# Altium PCB PCB_top.PcbDoc (part 1 of 2)
Units mil, origin at the board's own origin, x right, y up, seen from the top; angles counter-clockwise.
Board outline 2425.02 x 2425.02 mil, 4 copper layers (TOP, 2, 3, BOTTOM), stack 61.024 mil thick; 91 components, 64 nets, 335 pads, 235 vias.
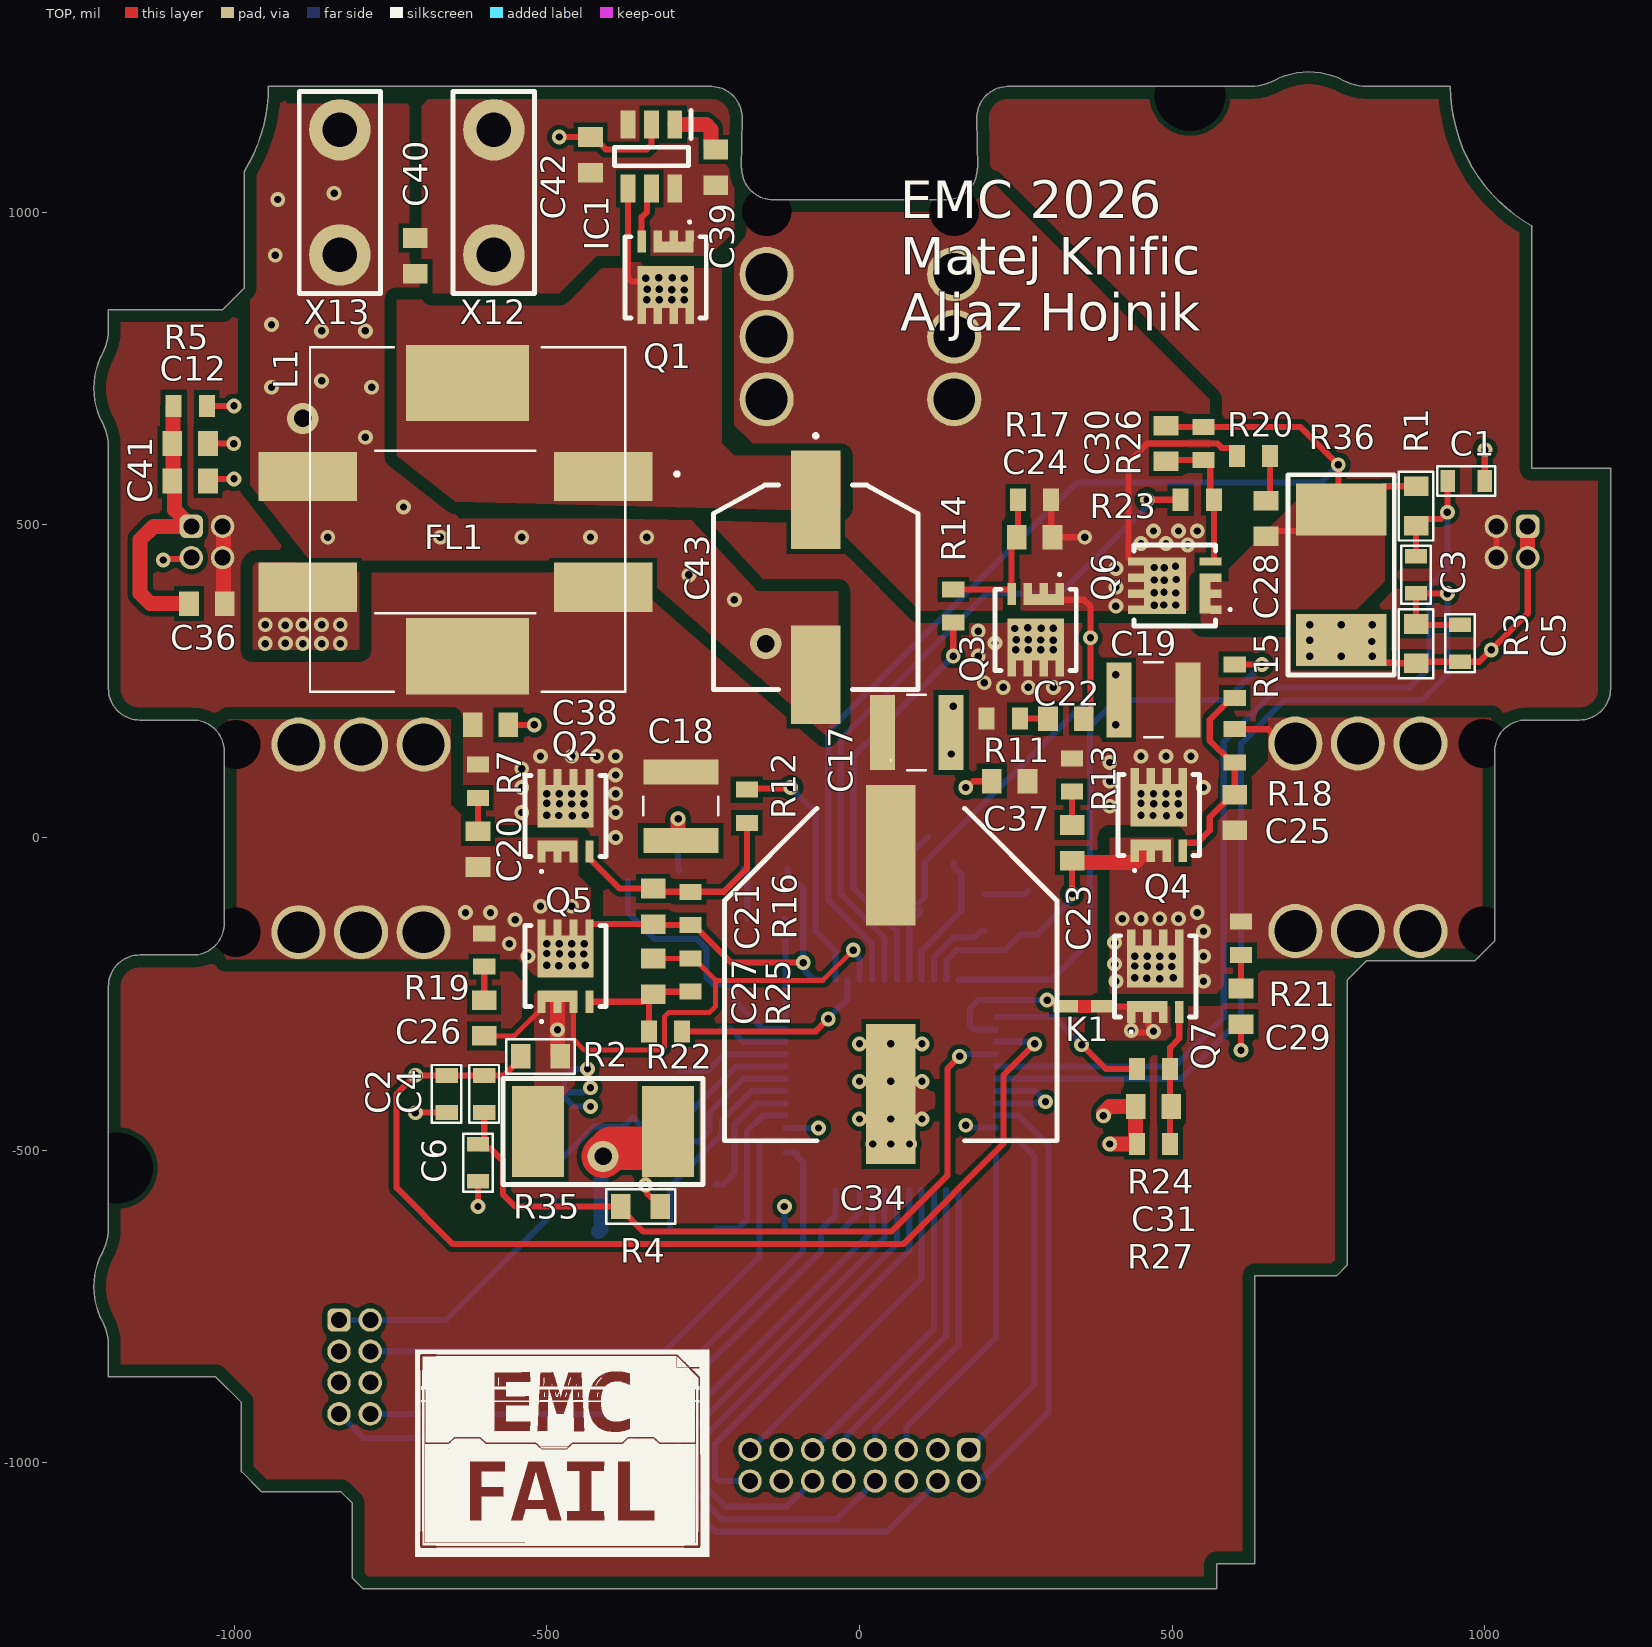
[diagram p0: TOP view]
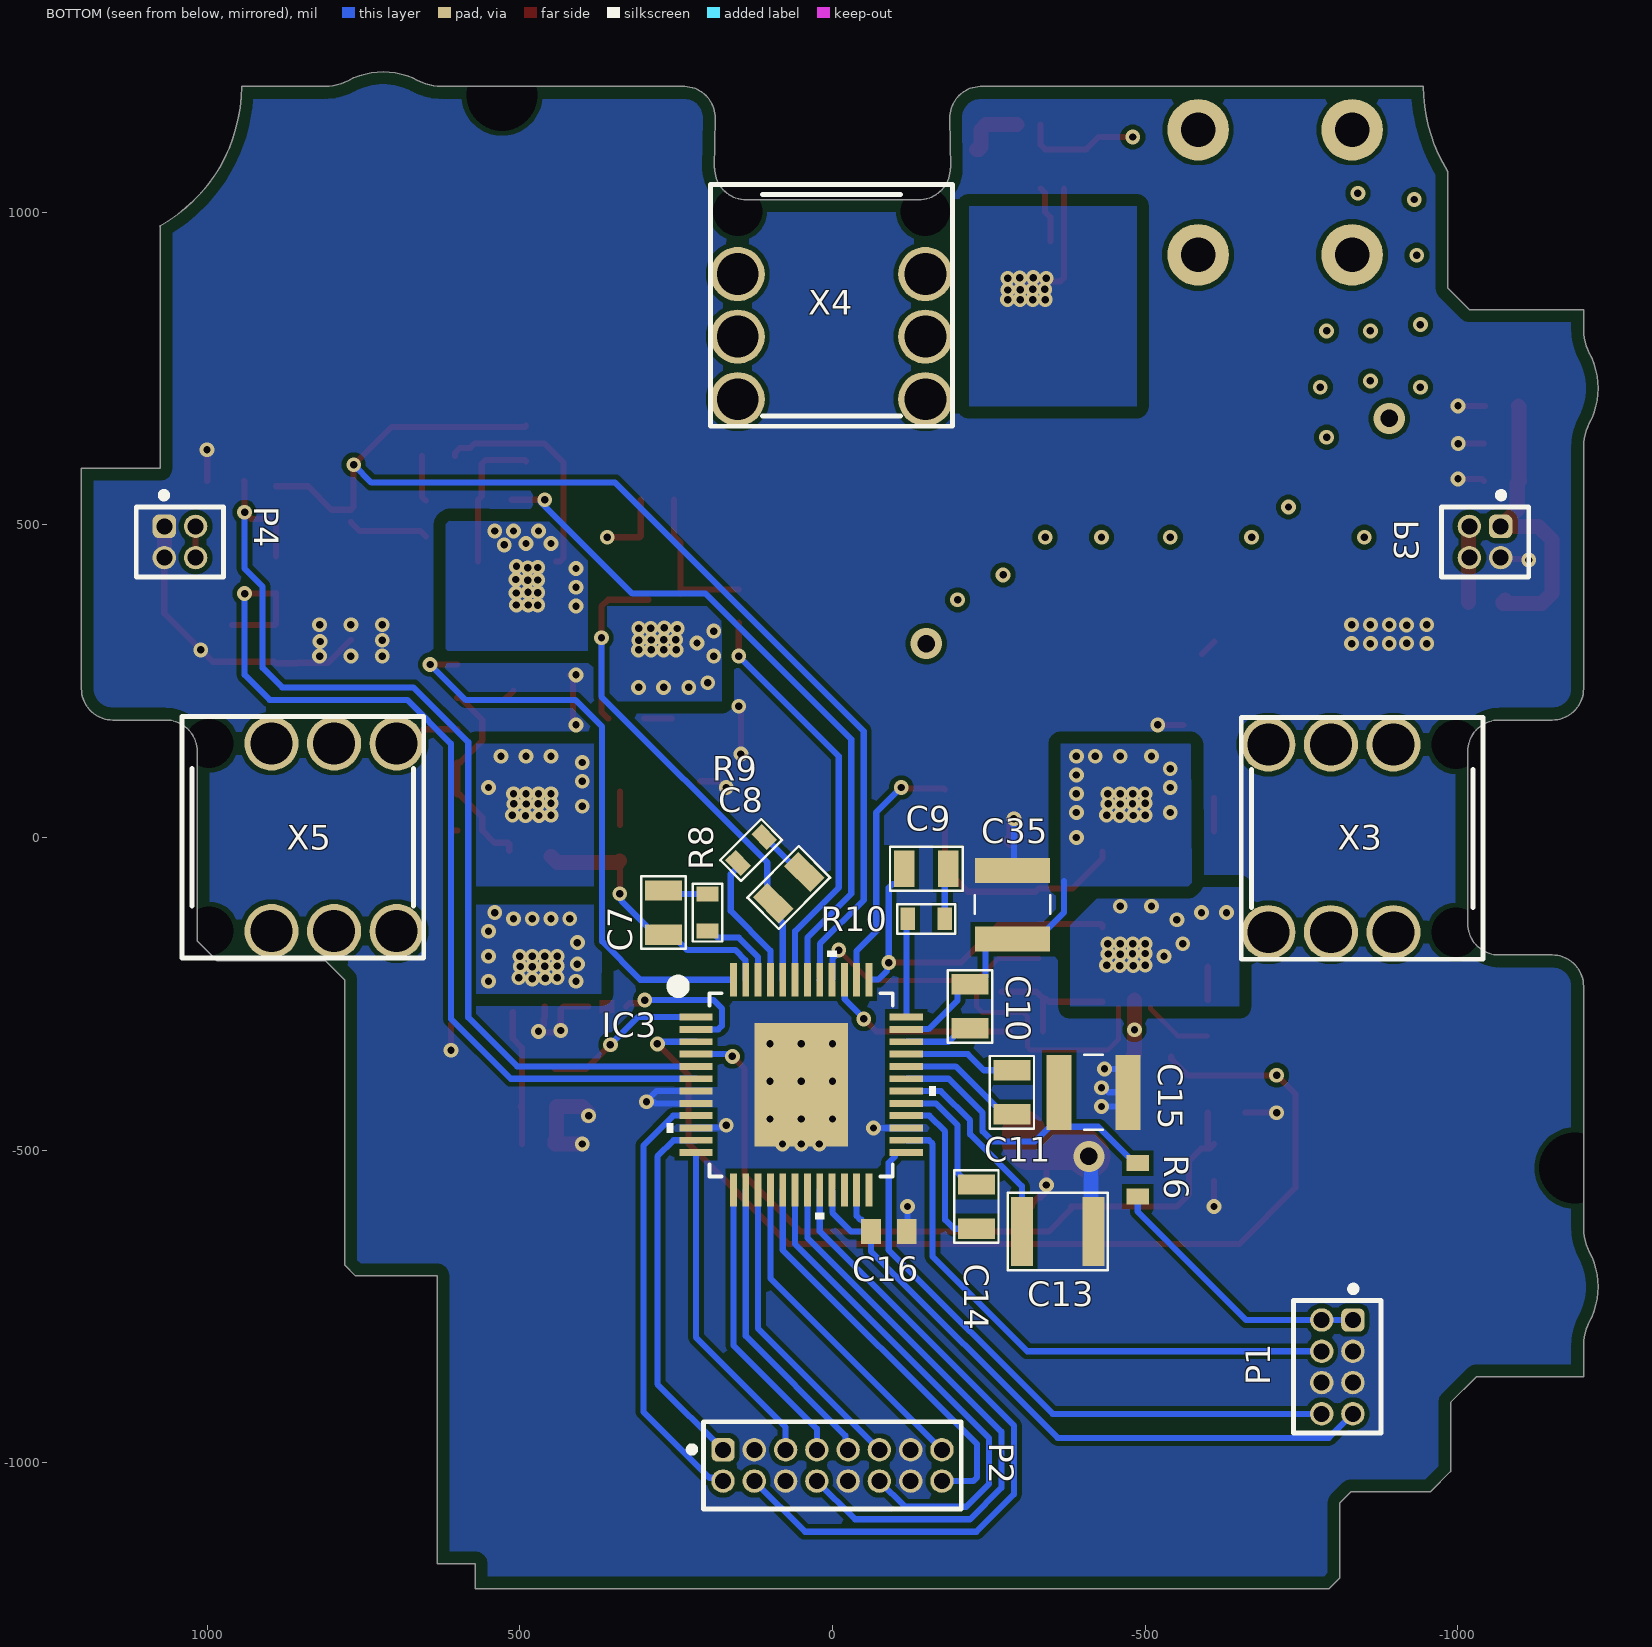
[diagram p1: BOTTOM view, seen from below]
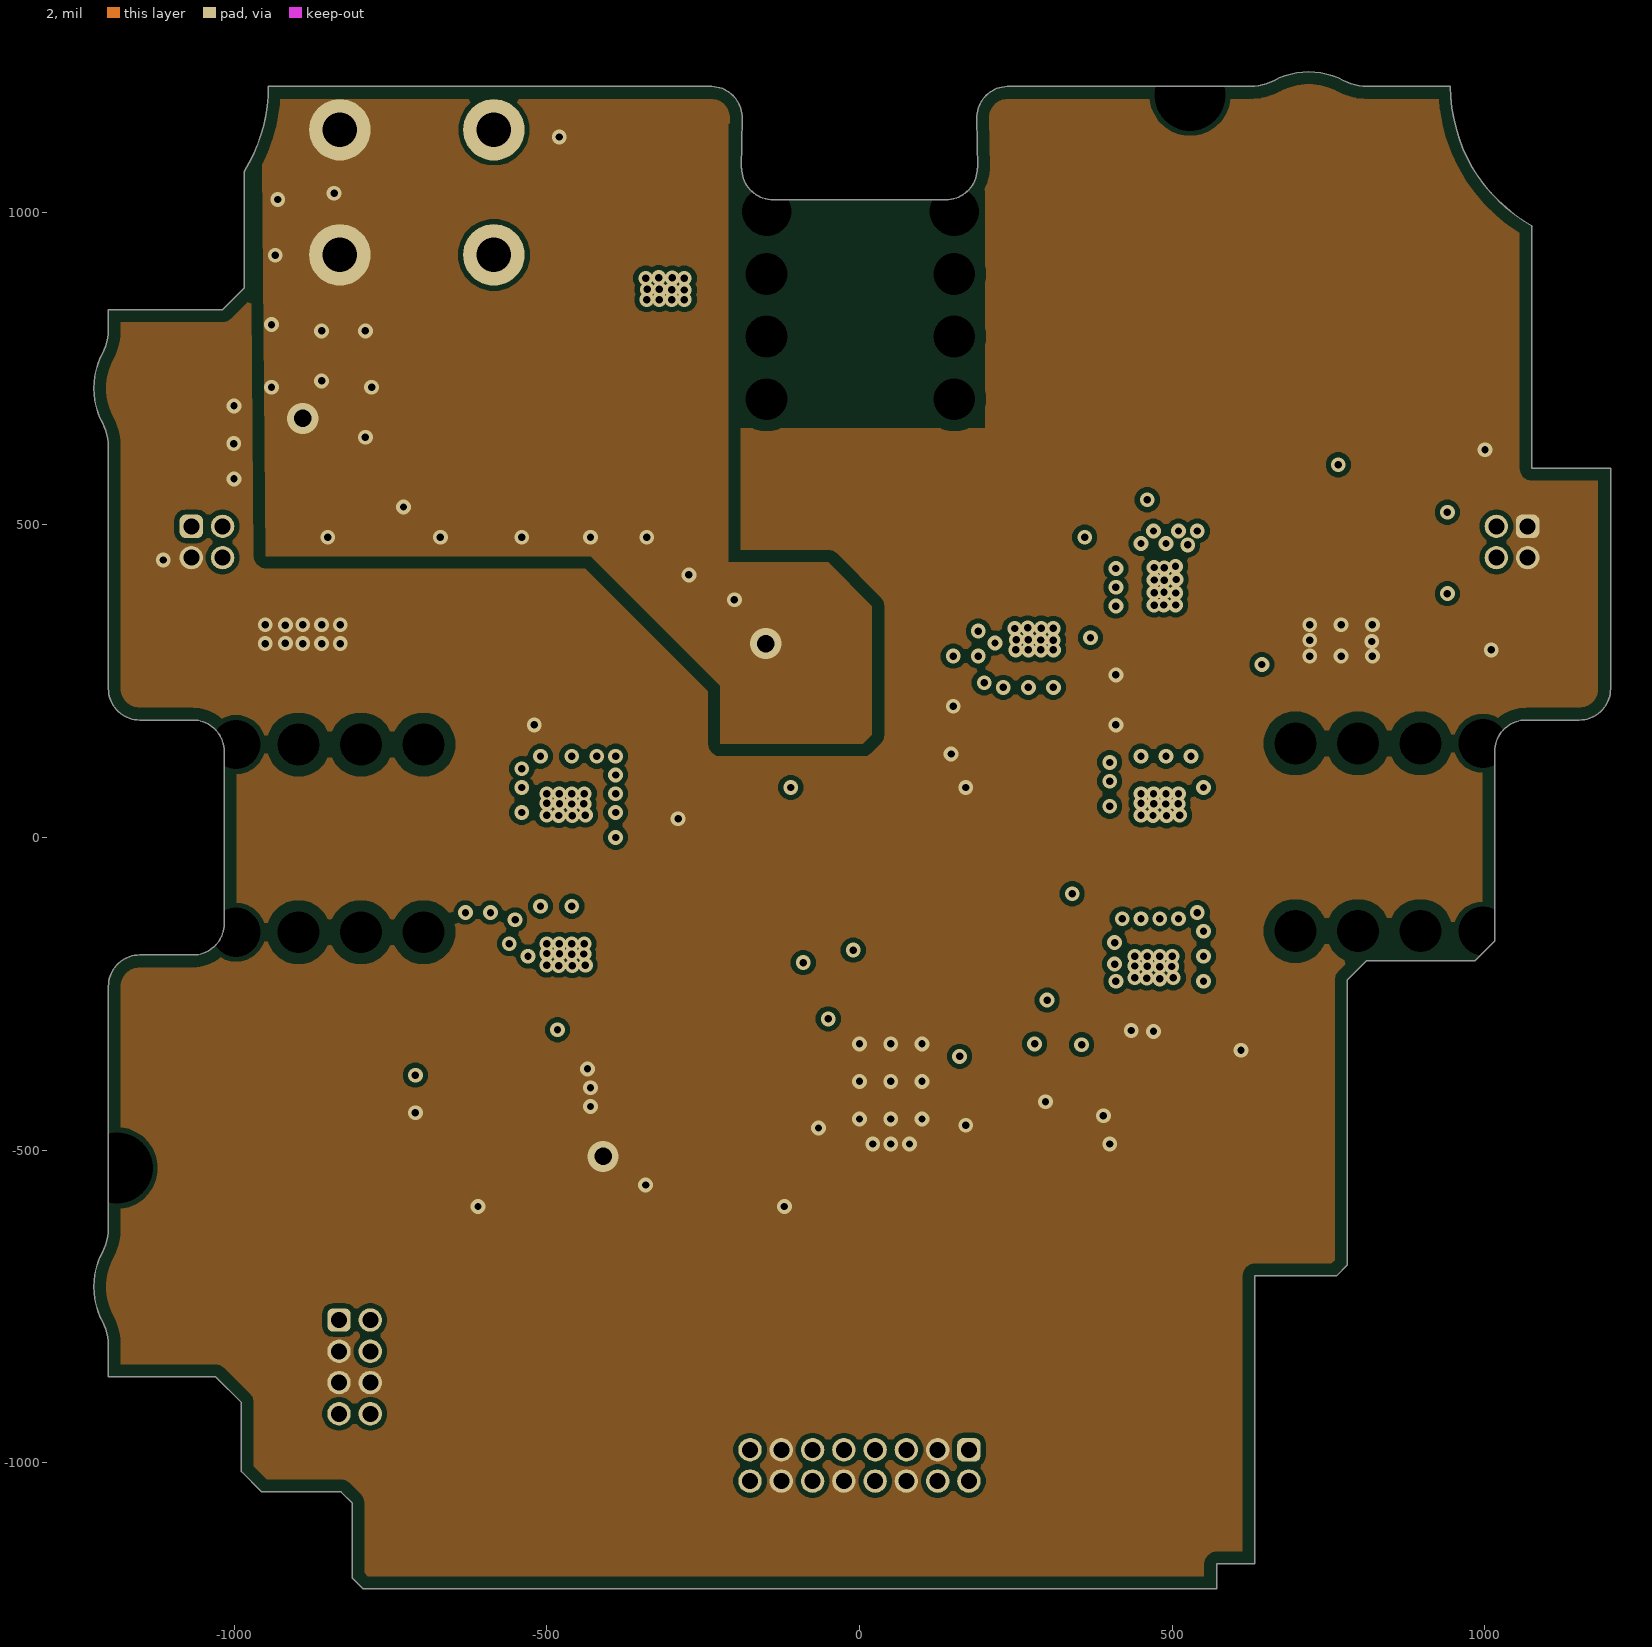
[diagram p2: 2]
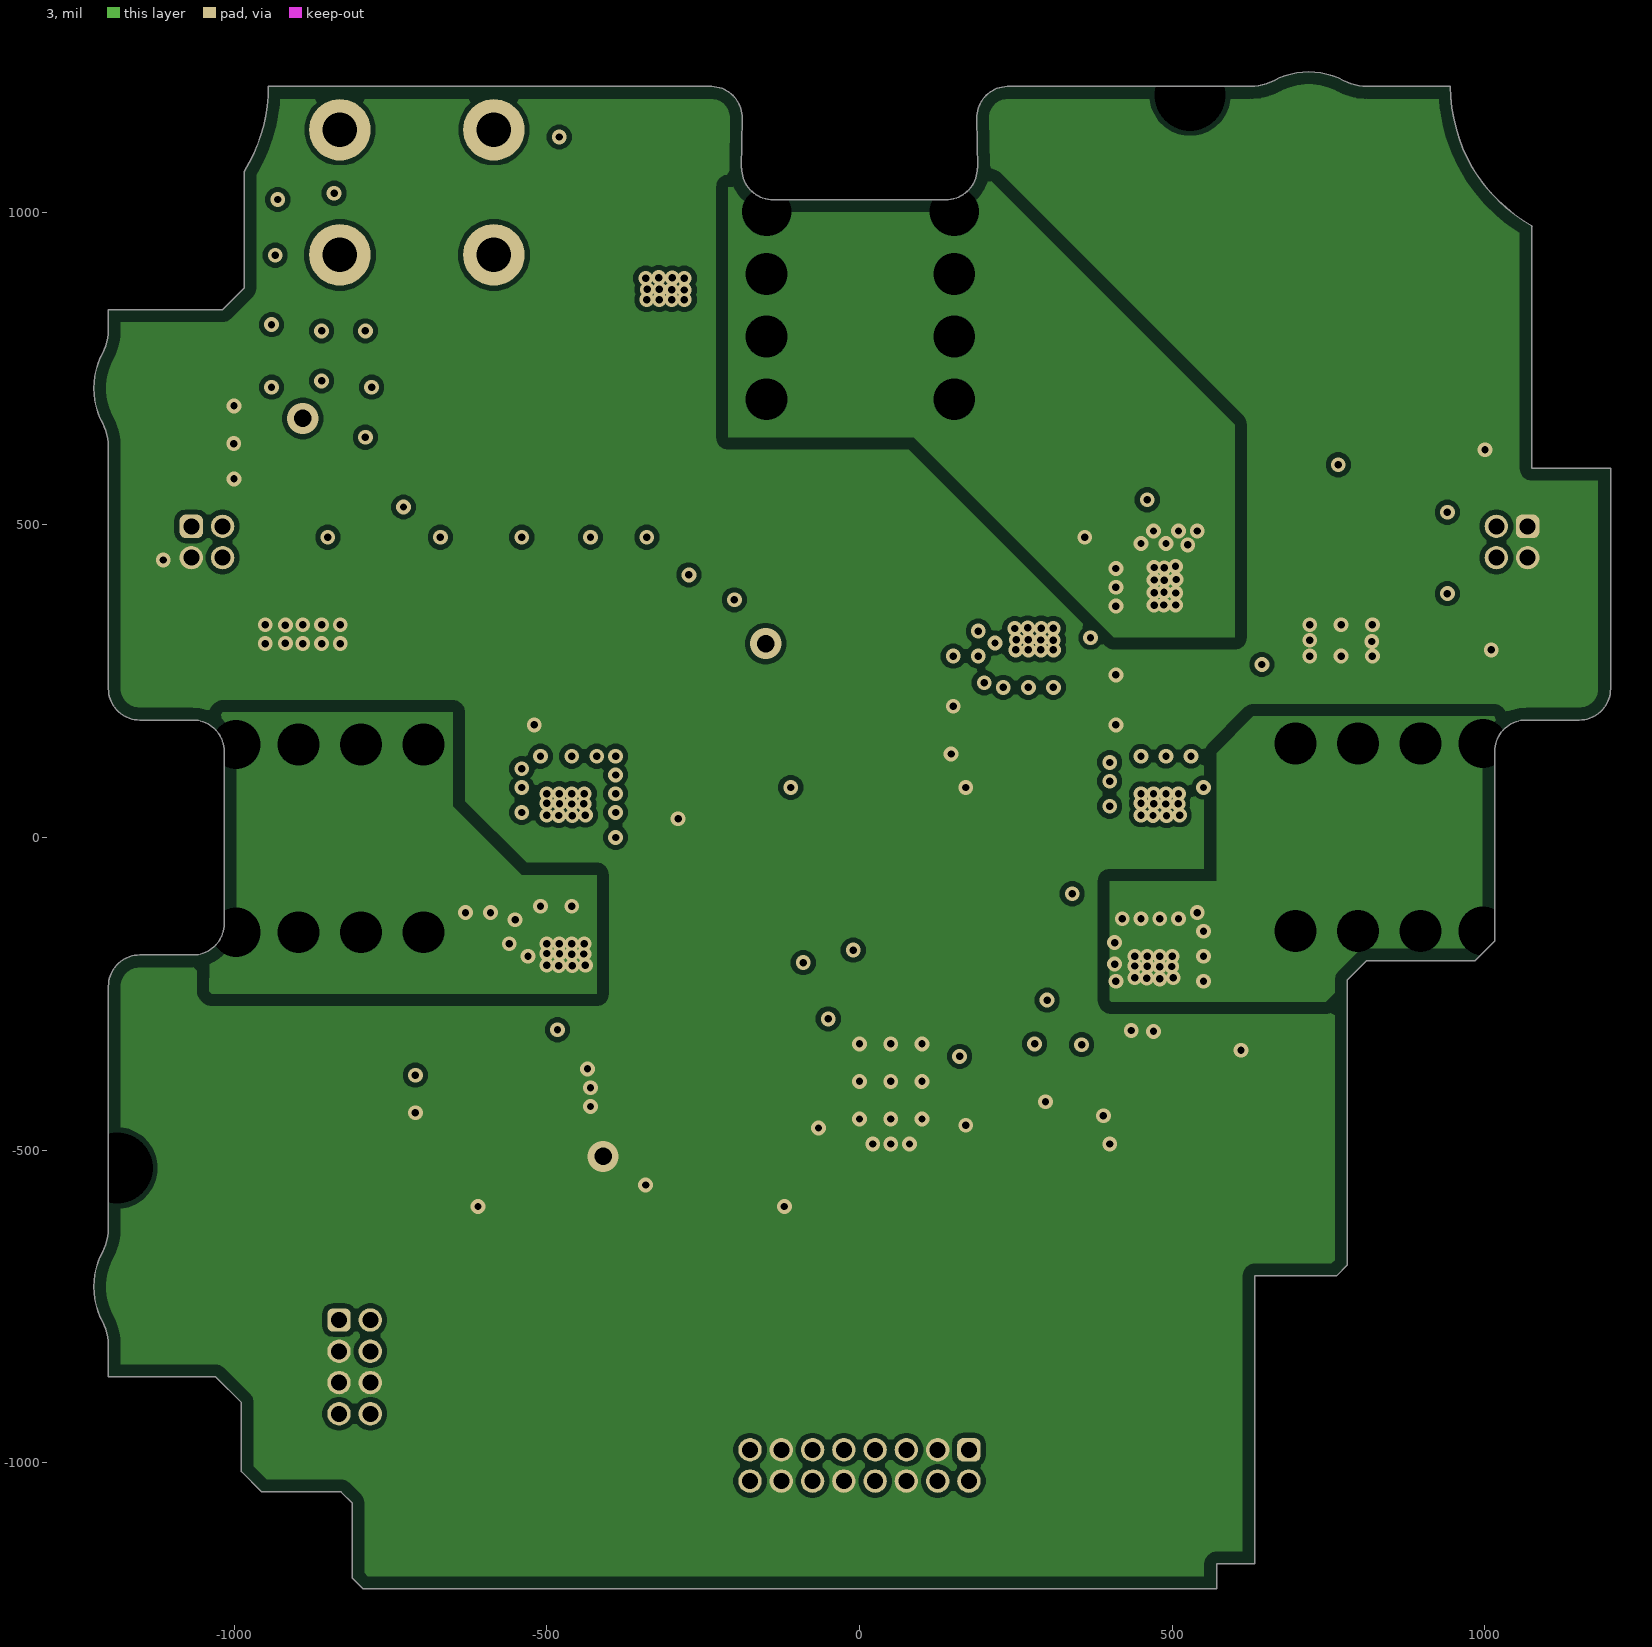
[diagram p3: 3]
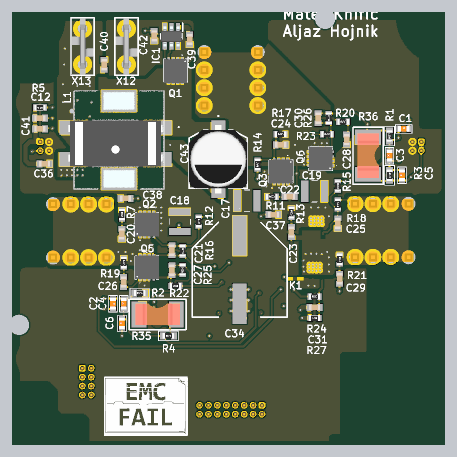
[diagram p4: 3D render of the assembled board from above, using the file's embedded part models]
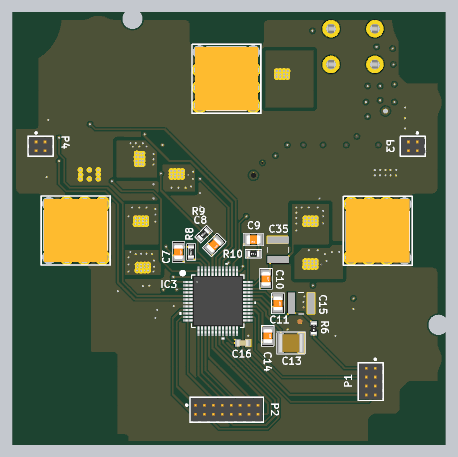
[diagram p5: 3D render of the assembled board from below, using the file's embedded part models]

## Layer stack, top to bottom
Top Solder: solder mask 0.3937, Solder Resist, Dk 3.5
TOP: signal copper 2.7559
Dielectric 4: prepreg 12.4016, PP-006, Dk 4.1
2: signal copper 1.378
Dielectric 3: core 27.9528, S1000-2, Dk 4.5
3: signal copper 1.378
Dielectric 2: prepreg 12.4016, PP-006, Dk 4.1
BOTTOM: signal copper 2.7559
Bottom Solder: solder mask 0.3937, Solder Resist, Dk 3.5

## Board outline
-1200.79,-811.49 ccw(c-1279.53,-811.49) -1210.16,-774.22 cw(c-1106.12,-718.32) -1210.16,-662.42 ccw(c-1279.53,-625.16) -1200.79,-625.16 -1200.79,-237.8 cw(c-1150.79,-237.8) -1150.79,-187.8 -1065.75,-187.8 ccw(c-1065.75,-137.8) -1015.75,-137.8 -1015.75,137.8 ccw(c-1065.75,137.8) -1065.75,187.8 -1150.79,187.8 cw(c-1150.79,237.8) -1200.79,237.8 -1200.79,625.16 ccw(c-1279.53,625.16) -1210.16,662.42 cw(c-1106.12,718.32) -1210.16,774.22 ccw(c-1279.53,811.49) -1200.79,811.49 -1200.79,844.17 -1018.03,844.17 -983.78,878.43 -983.78,1065.16 ccw(c-1200.79,1200.79) -944.88,1200.79 -236.22,1200.79 cw(c-237.55,1150.91) -187.67,1149.59 -188.94,1070.27 -188.5,1070.27 ccw(c-137.92,1070.27) -137.92,1019.69 137.92,1019.69 ccw(c137.92,1070.27) 188.5,1070.27 188.94,1070.27 187.67,1149.59 cw(c237.55,1150.91) 236.22,1200.79 625.16,1200.79 ccw(c625.16,1279.53) 662.42,1210.16 cw(c718.32,1106.12) 774.22,1210.17 ccw(c811.49,1279.53) 811.49,1200.79 944.88,1200.79 ccw(c1200.79,1200.79) 1075.51,977.64 1074.8,978.04 1074.8,590.55 1200.79,590.55 1200.79,237.8 cw(c1150.79,237.8) 1150.79,187.8 1065.75,187.8 ccw(c1065.75,137.8) 1015.75,137.8 1015.75,-165.54 984.44,-196.85 810.96,-196.85 779.53,-228.29 779.53,-683.99 762.53,-700.99 632.08,-700.99 632.09,-1161.42 570.87,-1161.42 570.87,-1200.79 -794.29,-1200.79 -811.02,-1184.06 -811.02,-1063.98 -828.74,-1046.26 -955.71,-1046.26 -988.19,-1013.78 -988.19,-903.54 -1029.53,-862.2 -1200.79,-862.2

## Design rules (kind name [scope] priority, off if disabled: settings)
BoardOutlineClearance [All] p1: gap=19.68 ignorepadtopadclearanceinfootprint=FALSE
Clearance "Clearance TP Bottom" [InPadClass('Test pads') AND OnBottomLayer vs InPadClass('Test pads') AND OnBottomLayer] p1: gap=100 ignorepadtopadclearanceinfootprint=FALSE
Clearance "Clearance PE" [InNet('PE')] p2: gap=19.68 ignorepadtopadclearanceinfootprint=FALSE
Clearance "Clearance spacers" [InComponentClass('Spacer')] p3: gap=19.68 ignorepadtopadclearanceinfootprint=FALSE
Clearance "Clearance Polygon" [InPolygon vs InPolygon] p4: gap=19.68 ignorepadtopadclearanceinfootprint=FALSE
Clearance "Clearance All" [NOT InComponent('U1') AND NOT InPadClass('Exception pads')] p5: gap=7.87 ignorepadtopadclearanceinfootprint=FALSE
Clearance "Clearance Via" [IsVia vs IsPad And Not (InComponentClass('PowerComponents') Or InPadClass('Power pads'))] p6 off: gap=9.84 ignorepadtopadclearanceinfootprint=FALSE
ComponentClearance "ComponentClearance Wave Soldering" [InComponentClass('THT Components')] p1: gap=118.11 collisioncheckmode=3 verticalgap=100000 showdistances=TRUE
ComponentClearance "ComponentClearance Selective Soldering" [InComponentClass('Selective Soldering Component')] p2: gap=118.11 collisioncheckmode=3 verticalgap=100000 showdistances=TRUE
ComponentClearance [OnLayer('Top Layer') vs OnLayer('Top Layer')] p3: gap=8 collisioncheckmode=3 verticalgap=10 showdistances=FALSE
FabricationTestPointUsage TestPointUsage [InNetClass('All Nets')] p1 off: valid=0 allowmultiple=FALSE
FabricationTestpoint Testpoint [(InNetClass('All Nets')) And ((IsPad And (OnTopLayer Or OnBottomLayer)))] p1 off: side=2 testpointundercomponent=FALSE minsize=39.37 maxsize=78.74 preferedsize=47.24 minholesize=0 maxholesize=78.74 preferedholesize=39.37 testpointgrid=0.39 allowsidebottom=TRUE usegrid=TRUE gridtolerance=0.01
FanoutControl Fanout_BGA [IsBGA] p1: bgadir=Out bgaviamode=Centered fanoutstyle=Auto fanoutdirection=InThenOut viagrid=1 // Fanout_BGA (Default Rule)
FanoutControl Fanout_LCC [IsLCC] p2: bgadir=Out bgaviamode=Centered fanoutstyle=Auto fanoutdirection=InThenOut viagrid=1 // Fanout_LCC (Default Rule)
FanoutControl Fanout_SOIC [IsSOIC] p3: bgadir=Out bgaviamode=Centered fanoutstyle=Auto fanoutdirection=InThenOut viagrid=1 // Fanout_SOIC (Default Rule)
FanoutControl Fanout_Small [(CompPinCount < 5)] p4: bgadir=Out bgaviamode=Centered fanoutstyle=Auto fanoutdirection=InThenOut viagrid=1 // Fanout_Small (Default Rule)
FanoutControl Fanout_Default [All] p5: bgadir=Out bgaviamode=Centered fanoutstyle=Auto fanoutdirection=InThenOut viagrid=1 // Fanout_Default (Default Rule)
Height [All] p1: minheight=0 maxheight=1574.8 prefheight=500
HoleSize [All] p1: absolutevalues=TRUE maxlimit=787.4 minlimit=11.81 maxpercent=80.000 minpercent=20.000
HoleToHoleClearance [All] p1: gap=11.81 allowstackedmicrovias=TRUE
MinimumAnnularRing [All] p1 off: minimumring=5.91
NetAntennae [All] p1 off: netantennaetolerance=0
PlaneClearance [All] p1: clearance=19.68
PlaneConnect [All] p1: planeconnectstyle=Direct reliefexpansion=20 reliefentries=4 reliefconductorwidth=10 reliefairgap=10
PolygonConnect "PolygonConnect Direct" [InPadClass('Direct pads')] p1: connectstyle=Direct reliefconductorwidth=10 reliefentries=4 polygonreliefangle="90 Angle" airgapwidth=10
PolygonConnect "PolygonConnect TestPads" [InPadClass('Test pads')] p2: connectstyle=Direct reliefconductorwidth=10 reliefentries=4 polygonreliefangle="90 Angle" airgapwidth=10
PolygonConnect PolygonConnect-PowerPads [InPadClass('Power pads')] p3: connectstyle=Direct reliefconductorwidth=39.37 reliefentries=4 polygonreliefangle="90 Angle" airgapwidth=7.87
PolygonConnect "PolygonConnect Via" [IsVia] p4: connectstyle=Direct reliefconductorwidth=10 reliefentries=4 polygonreliefangle="90 Angle" airgapwidth=10
PolygonConnect "PolygonConnect All" [All] p5: connectstyle=Direct reliefconductorwidth=11.81 reliefentries=4 polygonreliefangle="90 Angle" airgapwidth=9.84
RoutingCorners [All] p1: cornerstyle=45-Degree minsetback=78.74 maxsetback=78.74
RoutingVias [All] p1: holewidth=11.81 width=23.62 viastyle="Through Hole" minholewidth=11.81 minwidth=21.65 maxholewidth=39.37 maxwidth=78.74 viatemplateguid#1={F9BC3B68-C7FA-485B-9147-DE2A793F0151} viatemplatename#1=v06h03
SilkToSolderMaskClearance SilkscreenOverComponentPads [IsPad] p1: minsilkscreentomaskgap=10 clearancetoexposedcopper=TRUE
SolderMaskExpansion [All] p1: expansion=3.94 istentingtop=FALSE
SupplyNets "Schematic Supply Nets" [InNet('DC_LINK')] p1: voltage=0.000
SupplyNets "Schematic Supply Nets_2" [InNet('24V')] p2: voltage=0.000
SupplyNets "Schematic Supply Nets_3" [InNet('GND')] p3: voltage=0.000
SupplyNets "Schematic Supply Nets_9" [InNet('5V')] p4: voltage=0.000
Width [All] p1: maxlimit=393.7 minlimit=5.91 preferedwidth=9.84 toplayer_minwidth=7.87 bottomlayer_minwidth=7.87 minimp=50.000000 maximp=50.000000 favimp=50.000000
14 further rules are at their usual default settings.

## Classes and differential pairs
component class U_Input_Filter: C34 C36 C37 C38 C39 C40 C41 C42 C43 FL1 IC1 L1 Q1
pad class "Direct pads": X3-1 X4-1 X5-1
component class Power_Mosfet: C1 C2 C3 C4 C6 C17 C18 C19 C20 C21 C22 C23 C24 C25 C26 C27 C28 C29 C30 C31 K1 Q2 Q3 Q4 Q5 Q6 Q7 R1 R2 R3 R4 R7 R11 R12 R13 R14 R15 R16 R17 R18 R19 R20 R21 R22 R23 R24 R25 R26 R27 R35 R36 X3 X4 X5
pad class "Power pads": X13-1
component class Power_Driver: C7 C8 C9 C10 C11 C13 C14 C15 C16 C35 IC3 R6 R8 R9 R10
component class Main: C12 P1 P2 P3 P4 R5 X12 X13

## Components (designator, comment, footprint, x,y, rotation, side; value= is the part's Value field where it differs from the comment)
C1 "C_S_0603_10n_X7R" FPR_0603_C_R0 970,570 r0 top locked
C2 "C_S_0603_10n_X7R" FPR_0603_C_R0 -660,-410 r270 top locked
C3 "C_S_0603_1nF_X7R_3" FPR_0603_C_R0 890,420 r90 top locked
C4 "C_S_0603_1nF_X7R_3" FPR_0603_C_R0 -600,-410 r90 top locked
C5 "C_S_0603_10n_X7R" FPR_0603_C_R0 960,310.47 r90 top locked
C6 "C_S_0603_10n_X7R" FPR_0603_C_R0 -610,-520 r90 top locked
C7 "C_S_0805_1u_X7R_5" FPR_0805_C_R0_1 270,-120 r270 bottom locked
C8 "C_S_0805_1u_X7R_5" FPR_0805_C_R0_1 70,-80 r315 bottom locked
C9 "C_S_0805_1u_X7R_5" FPR_0805_C_R0_1 -150,-50 r0 bottom locked
C10 "C_S_0805_1u_X7R_5" FPR_0805_C_R0_1 -220,-270 r270 bottom locked
C11 "C_S_0805_1u_X7R_5" FPR_0805_C_R0_1 -286.74,-407.4 r270 bottom locked
C12 "1n X7R 100v" C0603 -1070,630 r0 top locked
C13 "C_S_1210_10u_X7R_6" FPR_1210_C_R0_10u -360,-630 r0 bottom locked
C14 "C_S_0805_1u_X7R_5" FPR_0805_C_R0_1 -230,-590 r270 bottom locked
C15 "10u X7R 50v" RCL1210 -417.34,-407.4 r180 bottom locked
C16 "100n X7R 25v" C0603 -90,-630 r180 bottom locked
C17 "1u X7R 100v" RCL1210 91.44,167.95 r0 top locked
C18 "1u X7R 100v" RCL1210 -285.56,50 r270 top locked
C19 "1u X7R 100v" RCL1210 469.85,220 r180 top locked
C20 "*" C0603 -610,-18.54 r270 top locked
C21 "*" C0603 -330,-110 r270 top locked
C22 "*" C0603 330,190 r0 top locked
C23 "*" C0603 340,-8.54 r270 top locked
C24 "*" C0603 280,480 r0 top locked
C25 "*" C0603 600,40 r270 top locked
C26 "*" C0603 -600,-288.54 r270 top locked
C27 "*" C0603 -329.92,-222.01 r90 top locked
C28 "*" C0603 650,510 r270 top locked
C29 "*" C0603 610,-270 r270 top locked
C30 "*" C0603 490,630 r90 top locked
C31 "*" C0603 470,-430 r180 top locked
C34 "EEVFK1J221Q" EEEFK0J332AQ 50,-219.06 r270 top locked
C35 "1u X7R 100v" RCL1210 -287.72,-107.44 r90 bottom locked
C36 "15n X7R 100V" C0603 -1043.31,374.02 r0 top locked
C37 "x" C0603 240,90 r180 top locked
C38 "100n X7R 100V" C0603 -590,180 r0 top locked
C39 "100n X7R 100v" C0603 -230,1071.46 r90 top locked
C40 "100n X7R 100v" C0603 -710,930 r270 top locked
C41 "15n X7R 100V" C0603 -1070,570 r180 top locked
C42 "22n X7R 100v" C0603 -430,1091.46 r90 top locked
C43 "UCD1J470MNL1GS" EEETC1V470P -70,400 r180 top locked
FL1 "PLT10HH501100PNL" PLT10HH101150PNL -646.22,488.58 r270 top locked
IC1 "AP74700QW6-7" SOT95P285X140-6N -332.6,1088.82 r270 top locked
IC3 "IC_D_DRV8334PHPR" FPR_HTQFP_48P 50,-395.47 r180 bottom locked
K1 "NetTie" FPR_NETTIE_0_3 348.66,-270 r180 top locked net-tie
L1 "PA4343.103NLT" PA4343103NLT -626.54,508.27 r180 top locked
P1 "62200821121" 62200821121 -807.09,-846.46 r270 bottom locked
P2 "62201621121" 62201621121 0,-1003.94 r180 bottom locked
P3 "62200421121" 62200421121#1 -1043.31,472.44 r270 bottom locked
P4 "62200421121" 62200421121#2 1043.31,472.44 r270 bottom locked
Q1 "BSZ075N08NS5ATMA1" BSZ075N08NS5ATMA1 -1245,975.55 r180 top locked
Q2 "BSZ075N08NS5ATMA1" BSZ075N08NS5ATMA1 465,-45.55 r0 top locked
Q3 "BSZ075N08NS5ATMA1" BSZ075N08NS5ATMA1 -653.39,412.01 r180 top locked
Q4 "BSZ075N08NS5ATMA1" BSZ075N08NS5ATMA1 1413.39,-44.06 r0 top locked
Q5 "BSZ075N08NS5ATMA1" BSZ075N08NS5ATMA1 465,-285.55 r0 top locked
Q6 "BSZ075N08NS5ATMA1" BSZ075N08NS5ATMA1 584.06,1337.8 r90 top locked
Q7 "BSZ075N08NS5ATMA1" BSZ075N08NS5ATMA1 1407.8,-302.01 r0 top locked
R1 "R_L_0603_10R_1%" FPR_0603_R_R0 890,530 r90 top locked
R2 "R_L_0603_10R_1%" FPR_0603_R_R0 -510,-350 r0 top locked
R3 "R_L_0603_10R_1%" FPR_0603_R_R0 890,310 r270 top locked
R4 "R_L_0603_10R_1%" FPR_0603_R_R0 -350,-590 r0 top locked
R5 "1M" R0603 -1070,690 r180 top locked
R6 "1R" R0603 -488.15,-547.31 r90 bottom locked
R7 "*" R0603 -610,90 r270 top locked
R8 "R_L_0603_3R_1%_1" FPR_0603_R_R0_1 200,-120 r90 bottom locked
R9 "R_L_0603_3R_1%_1" FPR_0603_R_R0_1 130,-20 r135 bottom locked
R10 "R_L_0603_3R_1%_1" FPR_0603_R_R0_1 -150,-130 r180 bottom locked
R11 "*" R0603 230,190 r0 top locked
R12 "0-3R" R0603 -180,50 r270 top locked
R13 "*" R0603 340,100 r270 top locked
R14 "0-3R" R0603 150,370 r90 top locked
R15 "0-3R" R0603 600,250 r270 top locked
R16 "100k" R0603 -270,-113.43 r270 top locked
R17 "100k" R0603 280,540 r0 top locked
R18 "100k" R0603 600,146.57 r90 top locked
R19 "*" R0603 -600,-180 r270 top locked
R20 "*" R0603 630,610 r0 top locked
R21 "*" R0603 610,-161.22 r270 top locked
R22 "0-3R" R0603 -310,-310 r180 top locked
R23 "0-3R" R0603 540,540 r0 top locked
R24 "0-3R" R0603 470,-370 r0 top locked
R25 "100k" R0603 -270,-220 r90 top locked
R26 "100k" R0603 550,630 r90 top locked
R27 "100k" R0603 470,-490 r180 top locked
R35 "R_L_2512_0R002_1%_4" FPR_2512_R_R1 -410,-470 r180 top locked
R36 "R_L_2512_0R002_1%_4" FPR_2512_R_R1 770,420 r90 top locked
X3 "K_WURTH_7461063" FPR_K_1P_WURTH -846.85,-1.38 r270 bottom locked
X4 "K_WURTH_7461063" FPR_K_1P_WURTH 1.57,850.79 r180 bottom locked
X5 "K_WURTH_7461063" FPR_K_1P_WURTH 846.85,0.39 r90 bottom locked
X12 "C_TE_FASTON_6.3_P5.08" FPR_TAB_6.3_P5.08_Pokončni -584.65,1031.5 r90 top locked
X13 "C_TE_FASTON_6.3_P5.08" FPR_TAB_6.3_P5.08_Pokončni -830.71,1031.5 r90 top locked

## Footprints (in the part's own frame and the unit in brackets; to place one, negate y for a bottom-side part, rotate by r counter-clockwise, add the part's x,y. Pads: shape width x height; smd on the part's side, far side on the other; paste and mask are expansions set on the pad)
62200421121#1 [mm]
  rrect50% 0.95x0.95 hole 0.65: 1(-0.635,0.635)
  round 0.95 hole 0.65: 2(-0.635,-0.635) 3(0.635,0.635) 4(0.635,-0.635)
  silkscreen extent -2.02,-1.78 1.42,1.78, body extent -1.27,-1.7 1.27,1.7, height 5.33
62200421121#2 [mm]
  rrect50% 0.95x0.95 hole 0.65: 1(-0.635,-0.635)
  round 0.95 hole 0.65: 2(-0.635,0.635) 3(0.635,-0.635) 4(0.635,0.635)
  silkscreen extent -2.02,-1.78 1.42,1.78, body extent -1.27,-1.7 1.27,1.7, height 5.33
62200821121 [mm]
  rrect50% 0.95x0.95 hole 0.65: 1(-1.905,0.635)
  round 0.95 hole 0.65: 2(-1.905,-0.635) 3(-0.635,0.635) 4(-0.635,-0.635) 5(0.635,0.635) 6(0.635,-0.635) 7(1.905,0.635) 8(1.905,-0.635)
  silkscreen extent -3.29,-1.78 2.69,1.78, body extent -2.54,-1.7 2.54,1.7, height 5.33
62201621121 [mm]
  rrect50% 0.95x0.95 hole 0.65: 1(-4.445,0.635)
  round 0.95 hole 0.65: 2(-4.445,-0.635) 3(-3.175,0.635) 4(-3.175,-0.635) 5(-1.905,0.635) 6(-1.905,-0.635) 7(-0.635,0.635) 8(-0.635,-0.635) 9(0.635,0.635) 10(0.635,-0.635) 11(1.905,0.635) 12(1.905,-0.635) 13(3.175,0.635) 14(3.175,-0.635) 15(4.445,0.635) 16(4.445,-0.635)
  silkscreen extent -5.83,-1.78 5.23,1.78, body extent -5.08,-1.7 5.08,1.7, height 5.33
BSZ075N08NS5ATMA1 [mm]
  rect 0.34x0.45 smd: 1(-24.724,0.357) 2(-24.074,0.357) 3(-23.424,0.357)
  rect 0.34x0.9 smd: 4(-22.774,0.582)
  rect 0.34x0.65 smd: 5(-22.774,3.607) 6(-23.424,3.607) 7(-24.074,3.607) 8(-24.724,3.607)
  rect 2.29x1.71 smd: 9(-23.749,2.427)
  rect 1.635x0.45 smd: 10(-24.074,0.807)
  silkscreen extent -25.4,-0.27 -22.1,3.68, body extent -25.45,0.33 -22.05,3.73, height 1.1
C0603 [mm] "Chip Capacitor, 2-Leads, Body 1,60x0,81mm, IPC Medium Density"
  rect 0.8x1 smd: 1(-0.725,0) 2(0.725,0)
  body extent -0.8,-0.4 0.8,0.4, height 0.81
EEEFK0J332AQ [mm]
  rect 5.7x2 smd: 1(-4.85,0) 2(4.85,0)
  silkscreen extent -8.73,-6.75 6.75,6.75
EEETC1V470P [mm]
  rect 2x4 smd: 1(0,-3.55) 2(0,3.55)
  silkscreen extent -4.15,-6.2 4.15,4.15, body extent -4.15,-4.85 4.15,4.85, height 10.2
FPR_0603_C_R0 [mm]
  rect 0.6x0.9 smd: 1(-0.75,0) 2(0.75,0)
  silkscreen extent -1.17,-0.6 1.17,0.6, body extent -0.8,-0.4 0.8,0.4, height 0.32
FPR_0603_R_R0 [mm]
  rect 0.8x1 smd: 1(-0.8,0) 2(0.8,0)
  silkscreen extent -1.4,-0.7 1.4,0.7, body extent -0.8,-0.41 0.8,0.41, height 0.47
FPR_0603_R_R0_1 [mm]
  rect 0.6x0.9 smd: 1(-0.75,0) 2(0.75,0)
  silkscreen extent -1.17,-0.6 1.17,0.6, body extent -0.8,-0.41 0.8,0.41, height 0.47
FPR_0805_C_R0_1 [mm]
  rect 0.83x1.5 smd: 1(-0.895,0) 2(0.895,0)
  silkscreen extent -1.48,-0.9 1.48,0.9, body extent -1,-0.62 1,0.63, height 0.8
FPR_1210_C_R0_10u [mm]
  rect 0.9x2.8 smd: 1(-1.45,0) 2(1.45,0)
  silkscreen extent -2.02,-1.58 2.02,1.58, body extent -1.7,-1.35 1.7,1.35, height 2.8
FPR_2512_R_R1 [mil]
  rect 83x145 smd: 1(-104.13,0) 2(104.13,0)
  silkscreen extent -160,-85 160,85, body extent -125,-60 125,60, height 33
FPR_HTQFP_48P [mil]
  rect 53.28x11 smd paste+0 mask+0: 1(-168.14,108.29) 2(-168.14,88.6) 3(-168.14,68.91) 4(-168.14,49.22) 5(-168.14,29.53) 6(-168.14,9.84) 7(-168.14,-9.85) 8(-168.14,-29.53) 9(-168.14,-49.23) 10(-168.14,-68.92) 11(-168.14,-88.6) 12(-168.14,-108.3) 25(168.14,-108.3) 26(168.14,-88.6) 27(168.14,-68.92) 28(168.14,-49.23) 29(168.14,-29.53) 30(168.14,-9.85) 31(168.14,9.84) 32(168.14,29.53) 33(168.14,49.22) 34(168.14,68.91) 35(168.14,88.6) 36(168.14,108.29)
  rect 11x53.28 smd paste+0 mask+0: 13(-108.29,-168.14) 14(-88.6,-168.14) 15(-68.92,-168.14) 16(-49.22,-168.14) 17(-29.53,-168.14) 18(-9.85,-168.14) 19(9.85,-168.14) 20(29.53,-168.14) 21(49.23,-168.14) 22(68.92,-168.14) 23(88.6,-168.14) 24(108.3,-168.14) 37(108.3,168.14) 38(88.6,168.14) 39(68.92,168.14) 40(49.23,168.14) 41(29.53,168.14) 42(9.85,168.14) 43(-9.85,168.14) 44(-29.53,168.14) 45(-49.22,168.14) 46(-68.92,168.14) 47(-88.6,168.14) 48(-108.29,168.14)
  rect 150x197 smd paste-98 mask+0: EPAD(0,0)
  silkscreen extent -215,-215 215,215, body extent -181,-181 181,181, height 47
FPR_K_1P_WURTH [mm]
  round 2.2 / inner round 0 / far side round 2.2 hole 1.7: 1(-3.81,-1.27) 1(-3.81,-3.81) 1(-3.81,1.27) 1(3.81,-3.81) 1(3.81,-1.27) 1(3.81,1.27)
  round 0 hole 2 unplated: 1(-3.81,3.81) 1(3.81,3.81)
  silkscreen extent -4.91,-4.91 4.91,4.91, body extent -4.5,-4.5 4.5,4.5, height 14
FPR_NETTIE_0_3 [mm]
  rect 1x0.5 smd paste-1.27 mask-0.025: 1(-1.05,0) 2(0.475,0)
  TOP region: -0.6,0.25 -0.6,-0.25 0,-0.25 0,0.25
FPR_TAB_6.3_P5.08_Pokončni [mm]
  round 2.5 hole 1.4: 1(-2.54,0) 1(2.54,0)
  silkscreen extent -4.1,-1.65 4.1,1.65, body extent -3.96,-1.54 3.96,1.54, height 10.21
PA4343103NLT [mm]
  rect 5x3.1 smd: 1(0,-5.55) 2(0,5.55)
  silkscreen extent -6.4,-7 6.4,7, body extent -6.4,-7 6.4,7, height 6.6
PLT10HH101150PNL [mm]
  rect 2x4 smd: 1(-2.25,6) 2(-2.25,-6) 3(2.25,-6) 4(2.25,6)
  silkscreen extent -3.3,-3.25 3.3,9.05, body extent -3.3,-6.7 3.3,6.7, height 9.4
R0603 [mm] "Chip Resistor, 2-Leads, Body 1,55x0,85mm, IPC Medium Density"
  rect 0.65x0.9 smd: 1(-0.675,0) 2(0.675,0)
  body extent -0.8,-0.41 0.8,0.41, height 0.45
RCL1210 [mil]
  rect 40x120 smd: 1(-55,0) 2(55,0)
  silkscreen extent -15,-60 15,60
SOT95P285X140-6N [mm]
  rect 1.15x0.6 smd: 1(-1.3,0.95) 2(-1.3,0) 3(-1.3,-0.95) 4(1.3,-0.95) 5(1.3,0) 6(1.3,0.95)
  silkscreen extent -1.88,-1.5 0.38,1.6, body extent -1.43,-1.5 1.43,1.5, height 1.4

## Part data
C1 C2 C5 C6: library part C_S_0603_10n_X7R-10, "Single capacitor 10 nF", Manufacturer=AVX, Manufacturer code=06035C103K4Z4A, TemperatureGrade=-55...125, Tolerance=10, Value [F]=10e-9, Voltage=50, AEC=16.6.2015, BS=BS1556, Class=15562, Datasheet=/, Housing=0603, HRVal=10nF, Mount=SMD, MSL=1, REACH=12.1.2017, ROHS=2011/65/EU, SAP Ident=628870, SAP Name="KONDENZATOR 06035C103K4Z4A AVX", UL=-
C3 C4: library part C_S_0603_1nF_X7R_3-1, "Single capacitor 1nF 5% AEC", Manufacturer=VISHAY, Manufacturer code=VJ0603Y102JXAAC, TemperatureGrade=-55...150, Tolerance=5, Value [F]=1e-9, Voltage=50, AEC=11.2.2018, BS=BS1556, Class=15562, Datasheet=https://eu.mouser.com/datasheet/2/427/vjcommercialseries-222796.pdf, Housing=0603, HRVal="1 nF", Mount=SMD, REACH=15.1.2019, ROHS=2011/65/EU, SAP Name="KONDENZATOR VJ0603Y102JXAAC VIS", UL=-
C7 C8 C9 C10 C11 C14: library part C_S_0805_1u_X7R_5-3, "Single capacitor 1uF 10% soft-term AEC200", Manufacturer=Murata, Manufacturer code=GCJ21BR71H105KA01L, TemperatureGrade=-55...125, Tolerance=10, Value [F]=1e-6, Voltage=50, AEC=21.8.2019, BS=BS1556, Class=15562, Datasheet=https://www.murata.com/~/media/webrenewal/support/library/catalog/products/capacitor/mlcc/c03e.ashx, Housing=0805, HRVal=1uF, Mount=SMD, MSL=1, REACH=20.6.2016, ROHS=2011/65/EU, SAP Ident=927197, SAP Name="KONDENZATOR GCJ21BR71H105KA01L MUR", UL=-
C12 C15 C16 C17 C18 C19 C20 C21 C22 C23 C24 C25 C26 C27 C28 C29 C30 C31 C35 C36 C37 C38 C39 C40 C41 C42: library part C, "Capacitor"
  C12 C37 C40: Parameter 1=dnp
C13: library part C_S_1210_10u_X7R_6-4, "Single capacitor 10uF", Manufacturer=AVX, Manufacturer code=12105C106K4Z4A, TemperatureGrade=-55...125, Tolerance=10, Value [F]=10e-6, Voltage=50, AEC=3.6.2019, BS=BS1556, Class=15562, Datasheet=/, Housing=1210, HRVal=10uF, Mount=SMD, MSL=/, REACH=15.1.2019, ROHS=2011/65/EU, SAP Ident=919177, SAP Name="KONDENZATOR 12105C106K4Z4A AVX", Shelf life="12 months", UL=-
C34: "Panasonic Aluminium Electrolytic Capacitor 220uF 63V dc 12.5mm Surface Mount FK SMD Series +105C", Manufacturer_Name=Panasonic, Datasheet Link=http://industrial.panasonic.com/cdbs/www-data/pdf/RDE0000/ABA0000C1181.pdf, Geometry.Height=15mm, Manufacturer_Part_Number=EEVFK1J221Q, vrednost="220uF 63V"
C43: library part EEE-FK1J470L, "Capacitor Polarised  / UCD1J470MNL1GS!!!!", Manufacturer_Part_Number=UCD1J470MNL1GS
FL1: "Filter", Manufacturer_Name="Murata Electronics", Mouser Part Number=81-PLT10HH501100PNL, Arrow Part Number=PLT10HH501100PNL, Arrow Price/Stock=https://www.arrow.com/en/products/plt10hh501100pnl/murata-manufacturing?region=nac, Datasheet Link=https://www.murata.com/en-us/products/productdetail?partno=PLT10HH501100PN%23, Height=9.4mm, Manufacturer_Part_Number=PLT10HH501100PNL, Mouser Price/Stock=https://www.mouser.co.uk/ProductDetail/Murata-Electronics/PLT10HH501100PNL?qs=UOUhb9503hEfTgGbug4ocA%3D%3D, Parameter 1=dnp
IC1: "Integrated Circuit", Manufacturer_Name="Diodes Incorporated", Mouser Part Number=621-AP74700QW6-7, Arrow Part Number=AP74700QW6-7, Arrow Price/Stock=https://www.arrow.com/en/products/ap74700qw6-7/diodes-incorporated?utm_currency=USD&region=europe, Datasheet Link=https://www.diodes.com//assets/Datasheets/AP74700Q.pdf, Height=1.4mm, Manufacturer_Part_Number=AP74700QW6-7, Mouser Price/Stock=https://www.mouser.co.uk/ProductDetail/Diodes-Incorporated/AP74700QW6-7?qs=vvQtp7zwQdPsSFAXTBJZqQ%3D%3D
IC3: library part IC_D_DRV8334PHPR-3, "Three phase MOSFET driver", Manufacturer=TI, Manufacturer code=DRV8334PHPR, Output Current="1000 / 2000 mA", Output Voltage=60, TemperatureGrade=-40...125, AEC=No, BS=BS1557, Class=15571, Datasheet=/, Housing=HTQFP, HRVal=DRV8334PHPR, Mount=SMD, MSL=1, REACH=23.07.2024, ROHS=2011/65/EU, SAP Ident=1125019, SAP Name="GONILNIK DRV8334PHPR TI", UL=-
K1: library part NetTie-10, "Net tie", ItemName=NetTie, Mount=THT
L1: "Inductor", Manufacturer_Name="Yageo Group", Mouser Part Number=673-PA4343.103NLT, Arrow Part Number=PA4343.103NLT, Arrow Price/Stock=https://www.arrow.com/en/products/pa4343.103nlt/pulse-electronics-corporation?region=nac, Datasheet Link=https://datasheet.datasheetarchive.com/originals/distributors/DKDS-10/182394.pdf, Height=6.5mm, Manufacturer_Part_Number=PA4343.103NLT, Mouser Price/Stock=https://www.mouser.co.uk/ProductDetail/Pulse-Electronics/PA4343.103NLT?qs=%2FzQKu7YvIMb8arzTB%2FvZ4w%3D%3D
P1: library part CMP-1502-00947-4, "THT Vertical Pin Header WR-PHD, Pitch 1.27 mm, Dual Row, 8 pins", Color=Black, Contact Resistance=20mΩ, Current Rating=1A, Connector Type="Male Pin", Contact Material=Copper, Contact Mating Length=3.81mm, Contact Plating=Gold, Gender=Male, Lead Pitch=1.27mm, Mount="Through Hole", Number of Contacts=8, Number of Pins=8, Number of Positions=8, Number of Rows=2, Orientation=Vertical, Packaging=Box, Pitch=1.27mm, ROHS=Compliant, Row Spacing=1.27mm, System=Connector, Termination=Solder
P2: library part CMP-1502-00950-4, "THT Vertical Pin Header WR-PHD, Pitch 1.27 mm, Dual Row, 16 pins", Color=Black, Contact Resistance=20mΩ, Current Rating=1A, Connector Type="Male Pin", Contact Material=Copper, Contact Mating Length=3.81mm, Contact Plating=Gold, Gender=Male, Lead Pitch=1.27mm, Mount="Through Hole", Number of Contacts=16, Number of Pins=16, Number of Positions=16, Number of Rows=2, Orientation=Vertical, Packaging=Box, Pitch=1.27mm, ROHS=Compliant, Row Spacing=1.27mm, System=Connector, Termination=Solder
P3 P4: library part CMP-1502-00946-4, "THT Vertical Pin Header WR-PHD, Pitch 1.27 mm, Dual Row, 4 pins", Color=Black, Contact Resistance=20mΩ, Current Rating=1A, Connector Type="Male Pin", Contact Material=Copper, Contact Mating Length=3.81mm, Contact Plating=Gold, Gender=Male, Lead Pitch=1.27mm, Mount="Through Hole", Number of Contacts=4, Number of Pins=4, Number of Positions=4, Number of Rows=2, Orientation=Vertical, Packaging=Box, Pitch=1.27mm, ROHS=Compliant, Row Spacing=1.27mm, System=Connector, Termination=Solder
R1 R2 R3 R4: library part R_L_0603_10R_1%-18, "Upor 10R 0603 1% 100mW", Manufacturer=ASJ, Manufacturer code=CR16-10R0-FY, Power=100e-3, TemperatureGrade=-40…155, Tolerance=1, Value [Ohm]=10, AEC=16.7.2015, BS=BS1556, Class=15561, Datasheet=https://www.asj.com.sg/pdfs/specs/1.0%20DS_General%20Thick%20Film%20Chip%20Resistor_19052017.pdf, Housing=0603, HRVal=10R, Mount=SMD, MSL=1, REACH=14.06.2023, ROHS=2011/65/EU, SAP Ident=220173, SAP Name="UPOR CR16-10R0-FY ASJ", Shelf life="12 months", UL=-
R5 R6 R7 R11 R12 R13 R14 R15 R16 R17 R18 R19 R20 R21 R22 R23 R24 R25 R26 R27: library part R, "R"
R8 R9 R10: library part R_L_0603_3R_1%_1-3, "Upor 3R 0603 1% 100mW", Manufacturer=VISHAY, Manufacturer code=CRCW06033R00FKEA, Power=100e-3, TemperatureGrade=-55...155, Tolerance=1, Value [Ohm]=3, AEC=11.6.2024, BS=BS1556, Class=15561, Datasheet=https://www.vishay.com/docs/20035/dcrcwe3.pdf, Housing=0603, HRVal=3R, Mount=SMD, MSL=1, REACH=23.1.2024, ReleaseDateNum=45455.4806185648, ROHS=2015/863/EU, SAP Ident=1125027, SAP Name="UPOR CRCW06033R00FKEA VIS", UL=1
R35 R36: library part R_L_2512_0R002_1%_4-1, "Upor 0R002 2512 1% AEC", Manufacturer=VISHAY, Manufacturer code=WSLF25122L000FEA, Power=5, TemperatureGrade=-65...170, Tolerance=1, Value [Ohm]=2e-3, AEC=19.6.2017, BS=BS1556, Cat1=2512, Class=15561, Created_At="19.12.2025 09:12:15 AM", Datasheet=/, FootprintDescription1="SMD resistor 2512 Reflow", FootprintName1=FPR_2512_R_R1, FootprintRevisionID1=FPR_2512_R_R1-1, Housing=2512, HRVal=R002, Latest_Revision=1, Mount=SMD, MSL=1, REACH=27.06.2024, ROHS=2011/65/EU, SAP Ident=******, SAP Name="UPOR WSLF25122L000FEA VIS", Shelf life=24mo, UL=-
X3 X4 X5: library part K_WURTH_7461063-4, "Connector POWER Wurth 7461063", Current=160, Manufacturer="WURTH ELEKTRONIK", Manufacturer code=7461063, TemperatureGrade=-40...150, Voltage=300, AEC=No, BS=BS1552, Class=15526, Datasheet=/, Housing=THT, HRVal=7461063, ItemName=K_WURTH_7461063, MaxCurrent=160, Mount=THT, MSL=1, PinCount=1, REACH=23.07.2024, ReleaseDateNum=45705.4409943981, ROHS=2011/65/EU, SAP Ident=1144983, SAP Name="KONEKTOR 7461063 WUE", Terminal pitch=/, UL=/
X12 X13: library part C_TE_FASTON_6.3_P5.08-4, "FASTON 6.3 P5.08 Pokončni", Current=-, Manufacturer="TE CONNECTIVITY", Manufacturer code=1217136-1, TemperatureGrade="-30...110 °C", Voltage=/, AEC=No, BS=BS1552, Class=15526, Datasheet=-, Housing=6.3x0.8mm, HRVal=1217136-1, Mount=THT, MSL=1, PinCount=1, REACH=21.1.2025, ROHS=2011/65/EU, SAP Ident=1163972, SAP Name="KONEKTOR 1217136-1 TEC", UL=/
Q1 Q2 Q3 Q4 Q5 Q6 Q7: ComponentLink1Description=Mouser, ComponentLink1URL=https://eu.mouser.com/ProductDetail/Infineon-Technologies/BSZ075N08NS5ATMA1?qs=3Bi3m9r5MQbCecwbz%252BCetA%3D%3D, ComponentLink2Description=Octopart, ComponentLink2URL=https://octopart.com/part/infineon/BSZ075N08NS5ATMA1

## Free pads (board coordinates)
  round 0 hole 114.17 unplated paste-99999 mask+3.94: 107(-1186.86,-528.44) 991(528.44,1186.88)

## Via types
v1: diameter 23.62, hole 11.81, TOP to BOTTOM, tented both sides, 139 vias
v2: diameter 23.62, hole 11.81, TOP to BOTTOM, 92 vias
v3: diameter 50, hole 28, TOP to BOTTOM, tented both sides, 3 vias
v4: diameter 23.62, hole 11.81, TOP to BOTTOM, tented top, 1 vias

## Nets (pads, with @x,y where several pads share a name; then routed paths per layer and width w, separated by ;. In a path a pad name is that pad's centre, name@x,y a point inside that pad or via, vN(x,y) a via of type N, cw(c..) or ccw(c..) an arc to the next point about the centre after c; other vN are vias at no path point)
5V: C16.1 IC3.21 IC3.23 P1.7 | length 1125.3
  BOTTOM w9.84: P1.7 -793.54,-960 -360,-960 -61.46,-661.46 C16.1 -30,-630 0.2,-599.8 0.2,-564.19 IC3.21 ; C16.1@-61.46,-626.06 -46.17,-610.78 -44.37,-610.78 -38.6,-605.02 IC3.23
24V: P1.1 P1.2 R6.1 | length 440
  BOTTOM w9.84: P1.1 P1.2 -661.46,-771.46 -488.15,-598.15 R6.1
DC_LINK: C10.1 C17.1 C18.1 C19.1 C34.1 C35.1 C36.2 C37.1 C38.1 FL1.4 IC3.35 L1.2 P3.2 P3.4 P4.2 P4.4 Q2.5 Q2.6 Q2.7 Q2.8 Q2.9 Q3.5 Q3.6 Q3.7 Q3.8 Q3.9 Q4.5 Q4.6 Q4.7 Q4.8 Q4.9 R7.1 R11.1 R13.1 | length 1269.6
  TOP w9.84: L1.2@-610.24,312.99 L1.2@-590.55,293.31 ; v2(-500,70) v2(-480,70) v2(-460,70) Q2.9@-460,53.71 ; v2(-499.91,54.62) v2(-499.91,35.71) Q2.9@-481.14,35.71 ; v2(-480.7,35.27) Q2.9@-480,35.97 ; v2(-479.65,54.27) -480,53.93 Q2.9@-480,35.97 ; Q2.9@-445,49.31 -438.24,42.55 v2(-438.24,35.76) -439.17,34.84 v2(-459.1,34.84) ; v2(-440.6,53.71) Q2.9@-460,53.71 ; v2(250.6,316.29) Q3.9@270,316.29 ; Q3.9@255,320.69 248.24,327.45 v2(248.24,334.24) 249.17,335.16 v2(269.1,335.16) ; v2(289.65,315.73) 290,316.07 Q3.9@290,334.03 ; v2(290.7,334.73) Q3.9@290,334.03 ; Q3.9@291.14,334.29 v2(309.91,334.29) v2(309.91,315.38) ; v2(310,300) v2(290,300) v2(270,300) Q3.9@270,316.29 ; v2(450,70) v2(470,70) v2(490,70) Q4.9@490,53.71 ; v2(450.09,54.62) v2(450.09,35.71) Q4.9@468.86,35.71 ; v2(469.3,35.27) Q4.9@470,35.97 ; v2(470.35,54.27) 470,53.93 Q4.9@470,35.97 ; Q4.9@505,49.31 511.76,42.55 v2(511.76,35.76) 510.83,34.84 v2(490.9,34.84) ; v2(509.4,53.71) Q4.9@490,53.71 ; C19.1@510,234.85 C19.1 ; P4.4 P4.2 ; Q2.9@-480,35.97 -478.87,34.84 v2(-459.1,34.84) ; Q2.9@-460,53.71 v2(-460.09,53.63) -460,53.54 -460,35.73 v2(-459.1,34.84) ; v2(269.1,335.16) 270,334.27 270,316.46 v2(270.09,316.37) Q3.9@270,316.29 ; v2(269.1,335.16) 288.87,335.16 Q3.9@290,334.03 ; Q4.9@470,35.97 471.13,34.84 v2(490.9,34.84) ; Q4.9@490,53.71 v2(489.91,53.63) 490,53.54 490,35.73 v2(490.9,34.84)
  TOP w24: P3.4 -1016.54,445.67 C36.2@-1016.54,375.79 ; P3.2 -1016.54,495.67 P3.4@-1016.54,447.44
  BOTTOM w9.84: -370,-70 -370,-120.16 -327.72,-162.44 C35.1 -259.69,-162.44 -244.61,-177.52 -244.61,-223.35 -233.19,-234.76 C10.1 -211.32,-234.76 -199.9,-246.18 -199.9,-260.1 -153.71,-306.29 -118.72,-306.29 IC3.35
  other v1: -390,0 -540,40 -390,40 400,50 -390,70 -540,80 550,80 400,90 -390,100 -540,110 400,120 -510,130 -460,130 -420,130 -390,130 450,130 490,130 530,130 230,240 270,240 310,240 199.49,247.51 190,290 216.65,311.05 190,330
  other v2: -440,70 510,70 250,300
GATE_UH: IC3.38 R12.1 | length 408.3
  TOP w9.84: R12.1 -178.29,78.29 -111.71,78.29 v1(-110,80)
  BOTTOM w9.84: v1(-110,80) -70,40 -70,-150 -38.6,-181.4 IC3.38
GATE_UL: IC3.39 R22.1 | length 317.3
  TOP w9.84: R22.1 -70,-310 v1(-50,-290)
  BOTTOM w9.84: v1(-50,-290) -50,-288.96 -19.49,-258.46 -19.49,-227.91 IC3.39
GATE_VH: IC3.43 R14.1 | length 666
  TOP w9.84: v1(150,290) R14.1
  BOTTOM w9.84: IC3.43 59.85,-149.85 -10,-80 -10,130 v1(150,290)
GATE_VL: IC3.42 R23.1 | length 1120.4
  TOP w9.84: v1(460,540) R23.1
  BOTTOM w9.84: IC3.42 40.15,-160.15 -30,-90 -30,157.11 202.89,390 320,390 v1@466.37,536.37
GATE_WH: IC3.48 R15.1 | length 938.6
  TOP w9.84: R15.1 v1(643.43,276.57)
  BOTTOM w9.84: IC3.48 307.33,-227.33 368.46,-166.2 368.46,177.47 410.99,220 586.85,220 v1(643.43,276.57)
GATE_WL: IC3.1 R24.1 | length 259.6
  TOP w9.84: v1@355.15,-331.19 393.96,-370 R24.1
  BOTTOM w9.84: IC3.1 311.07,-287.18 v1(355.12,-331.22)
GND: C1.2 C2.2 C5.1 C6.1 C12.2 C13.1 C15.2 C16.2 C17.2 C18.2 C19.2 C29.2 C31.2 C34.2 C35.2 C37.2 C38.2 C41.1 FL1.3 IC3.7 IC3.8 IC3.10 IC3.27 IC3.EPAD K1.1 P1.3 P1.5 P1.6 P2.3 P2.6 P2.10 P2.13 P2.14 P3.3 P4.1 P4.3 Q7.1 Q7.2 Q7.3 Q7.10 R3.2 R4.2 R5.1 R27.2 R35.1 R36.1 | length 2765
  TOP w9.84: v1(-1113.19,443.65) -1111.29,445.54 -1070.2,445.54 P3.3 ; R5.1 v1(-1000,690) ; C41.1 -1038.12,573.34 v1(-1000,573.34) ; C12.2 -1041.21,629.76 v1(-1000.55,629.76) ; v1(-710,-440) -709.76,-439.76 -660.24,-439.76 C2.2 ; v1(-610,-590) C6.1 ; C38.2 v1(-520,180) ; R4.2 -318.5,-586.06 -329.33,-575.24 -333.27,-575.24 -339.86,-568.65 -339.86,-557.64 v1(-341.94,-555.55) -341.94,-506.08 R35.1 ; v1(0,-450) 15.55,-450 C34.2@15.55,-475.75 ; C34.2@30,-432.1 30,-404.45 15.55,-390 v1(0,-390) v1(50,-390) ; C34.2@41.97,-470 C34.2@41.97,-448.03 ; v1(50,-450) 41.97,-450 29.26,-437.3 29.26,-431.37 50,-410.63 C34.2 ; C34.2@50,-400.94 v1(50,-390) ; v1(100,-330) 84.45,-330 50,-364.45 v1(50,-390) ; v1(146.44,133.56) 146.44,206.44 v1(150,210) ; v1(170,80) 172.13,80 182.13,90 C37.2 ; K1.1 430,-270 434.41,-274.41 v1(434.41,-308.62) 437.36,-311.57 468.43,-311.57 v1(470,-310) 470,-308.79 461.77,-300.56 461.77,-289.72 Q7.2 Q7.10 ; v1(410,180) 415,185 C19.2@415,255 ; v1(410,260) C19.2@415,255 ; C19.2@420,260 C19.2@415,255 ; v1(610,-340) C29.2 ; R36.1 806.58,279.29 854.77,279.29 855.55,278.5 R3.2 892.44,280.94 990.94,280.94 1068.31,358.31 P4.3 ; C1.2 999.76,570.24 999.76,619.76 v1(1000,620)
  TOP w24: v1(-290,30) -290,-0.56 C18.2 ; v1(390,-445) 390,-440 400,-430 C31.2 441.46,-483.11 443.43,-485.08 R27.2 v1(400,-490) ; P4.3 P4.1
  TOP w69: v3(-410,-510) -396.87,-496.87 -312.87,-496.87 -305.87,-489.87 R35.1
  BOTTOM w9.84: v1(-434.94,-370) -457.26,-370 -472.34,-385.08 C15.2 ; v1(-430,-430) -457.26,-430 -472.34,-414.92 C15.2 ; v1(-430,-400) -433.73,-400 -441.13,-407.4 C15.2 ; v1(-290,30) -290,-50.16 C35.2 ; v1(-120,-590) -120,-628.54 C16.2 ; IC3.27 v1(-65.61,-464.39) ; v1(170,-460) 173.73,-460 177.54,-463.81 217.56,-463.81 IC3.10 ; IC3.8 283.27,-425.01 285.64,-422.64 v1(297.36,-422.64) 297.36,-421.09 281.59,-405.32 IC3.7
  BOTTOM w24: C13.1 -413.54,-626.46 -413.54,-513.54 v3(-410,-510)
  other v1: 21.06,-490.04 80,-490 100,-450 100,-390 0,-330 50,-330 1010,300 -950,310 -890,310 -860,310 -830,310 -917.87,310.47 -950,340 -917.87,339.61 -890,340 -860,340 -830,340
  other v2: 720,290 770,290 820,290 819.19,313.39 719.82,315.44 720,340 770,340 820,340
  other v4: 50,-490
GND_IN: C40.2 C42.2 C43.2 FL1.2 IC1.2 X13.1 | length 187.4
  TOP w9.84: v1(-480,1120) C42.2 ; C42.2@-426.06,1120 -406.06,1100 -340,1100 -332.6,1107.4 IC1.2
  other v1: -200,380 -272.76,419.9 -850,480 -670,480 -540,480 -430,480 -340,480 -729.06,528.35 -790,640 -940,720 -780,720 -860,730 -860,810 -790,810 -940,820 -934.25,930.95 -930,1020 -840,1030
  other v3: -150,310 -890,670
I_D_SPI_MISO: IC3.17 P2.16 | length 646.7
  BOTTOM w9.84: P2.16 -225.3,-1028.94 -231.06,-1023.17 -231.06,-970.14 79.53,-659.54 IC3.17
NetC7_1: C7.1 R8.2 | length 72.4
  BOTTOM w9.84: R8.2 264.29,-90.47 C7.1
NetC8_1: C8.1 R9.2 | length 87.2
  BOTTOM w9.84: C8.1 53.16,-55.08 R9.2
NetC9_1: C9.1 R10.2 | length 82.4
  BOTTOM w9.84: C9.1 -179.53,-55.71 R10.2
NetC10_2: C10.2 IC3.34 | length 110.7
  BOTTOM w9.84: C10.2 -206.81,-305.24 -185.49,-326.56 IC3.34
NetC11_1: C11.1 IC3.33 | length 179.3
  BOTTOM w9.84: C11.1 -242.17,-372.17 -216.25,-346.25 IC3.33
NetC11_2: C11.2 IC3.32 | length 200.4
  BOTTOM w9.84: C11.2 -273.55,-442.64 -196.85,-365.94 IC3.32
NetC13_2: C13.2 IC3.30 | length 333.4
  BOTTOM w9.84: C13.2 -302.91,-557.67 -220,-474.76 -220,-452.24 -173.07,-405.32 IC3.30
NetC14_1: C14.1 IC3.29 | length 211.3
  BOTTOM w9.84: C14.1 -216.81,-554.76 -205.39,-543.35 -205.39,-541.26 -200,-535.87 -200,-460 -165.01,-425.01 IC3.29
NetC14_2: C14.2 IC3.28 | length 269.6
  BOTTOM w9.84: C14.2 -229.62,-625.62 -194.57,-625.62 -180,-611.05 -180,-470 -154.7,-444.7 IC3.28
NetC15_1: C15.1 IC3.31 R6.2 | length 468.2
  BOTTOM w9.84: R6.2@-480,-520 -480,-517.51 -424.97,-462.48 -377.42,-462.48 -362.34,-447.4 -323.9,-485.84 -256.14,-485.84 -240,-469.7 -240,-440 -185.63,-385.63 IC3.31
NetC20_1: C20.1 R7.2 | length 53.4
  TOP w9.84: C20.1 R7.2
NetC21_1: C21.1 Q2.4 R12.2 R16.1 | length 373.4
  TOP w9.84: Q2.4 -431.61,-33.66 -383.82,-81.46 C21.1 -324.61,-86.85 R16.1 -216.85,-86.85 -180,-50 R12.2
NetC22_1: C22.1 R11.2 | length 44.9
  TOP w9.84: R11.2 C22.1
NetC23_1: C23.1 R13.2 | length 53.4
  TOP w9.84: C23.1 R13.2
NetC24_1: C24.1 Q3.4 R14.2 R17.1 | length 254.8
  TOP w9.84: R14.2 241.46,396.57 243.23,394.8 Q3.4 243.23,471.77 C24.1 253.43,481.97 R17.1
NetC25_1: C25.1 Q4.4 R15.2 R18.1 | length 333.1
  TOP w9.84: Q4.4 516.77,-10.12 518.54,-8.35 540.45,-8.35 560,11.2 560,32.48 596.06,68.54 C25.1 R18.1 595.08,120 560,155.08 560,188.35 595.08,223.43 R15.2
NetC26_1: C26.1 R19.2 | length 53.4
  TOP w9.84: C26.1 R19.2
NetC27_1: C27.1 Q5.4 R22.2 R25.1 | length 221.1
  TOP w9.84: Q5.4 -345.95,-262.64 -340.51,-257.2 C27.1@-336.57,-257.2 ; R22.2 C27.1@-336.57,-257.2 ; R25.1 -325.95,-246.57 C27.1 C27.1@-336.57,-257.2
NetC28_1: C28.1 R20.2 | length 74.2
  TOP w9.84: C28.1 656.57,545.12 R20.2
NetC29_1: C29.1 R21.2 | length 53.8
  TOP w9.84: C29.1 R21.2@610,-187.68
NetC30_1: C30.1 Q6.4 R23.2 R26.1 | length 232.8
  TOP w9.84: C30.1 491.97,603.43 554.92,603.43 560.89,597.46 560.89,545.68 R23.2 Q6.4@566.57,441.18
NetC31_1: C31.1 Q7.4 R24.2 R27.1 | length 218.6
  TOP w9.84: R27.1 496.57,-431.97 C31.1 496.57,-428.03 R24.2 496.57,-335.79 511.18,-321.18 Q7.4
NetC39_2: C39.2 IC1.1 | length 98.5
  TOP w24: IC1.1 -245.39,1140 -237.69,1132.29 -237.69,1103.75 -233.94,1100 C39.2
NetIC1_5: IC1.5 Q1.4 | length 91.5
  TOP w9.84: Q1.4 -348.39,991.61 -339.49,1000.51 -339.49,1030.75 IC1.5
NetIC3_36: IC3.36 R10.1 | length 158.1
  BOTTOM w9.84: R10.1 -118.14,-132.33 IC3.36
NetIC3_45: IC3.45 R9.1 | length 217.7
  BOTTOM w9.84: IC3.45 99.22,-180.78 162.71,-117.29 162.71,-58.48 150.88,-46.65 R9.1
NetIC3_46: IC3.46 R8.1 | length 134.5
  BOTTOM w9.84: IC3.46 118.92,-191.08 150,-160 183.62,-160 194.09,-149.53 R8.1
O_D_EN_GATE: IC3.9 P2.2 | length 703
  BOTTOM w9.84: P2.2 180.27,-1023.66 196.75,-1023.66 302.43,-917.99 302.43,-492.43 254.7,-444.7 IC3.9
O_D_PWM_UH: IC3.11 P2.1 | length 585
  BOTTOM w9.84: P2.1 280,-873.94 280,-510 254.08,-484.08 IC3.11
O_D_PWM_UL: IC3.12 P2.5 | length 534.5
  BOTTOM w9.84: P2.5 75,-942.65 218.14,-799.51 IC3.12
O_D_PWM_VH: IC3.13 P2.7 | length 470.5
  BOTTOM w9.84: P2.7 25,-945 158.29,-811.71 IC3.13
O_D_PWM_VL: IC3.14 P2.9 | length 483.1
  BOTTOM w9.84: P2.9 -20.74,-974.68 -20.74,-956.34 138.6,-796.99 IC3.14
O_D_PWM_WH: IC3.15 P2.11 | length 495.6
  BOTTOM w9.84: P2.11 118.92,-785.02 IC3.15
O_D_PWM_WL: IC3.16 P2.15 | length 528.9
  BOTTOM w9.84: P2.15 99.22,-704.71 IC3.16
O_D_SPI_CLK: IC3.19 P2.8 | length 945.9
  BOTTOM w9.84: P2.8 -36.06,-1090 -220,-1090 -270,-1040 -270,-950 40.15,-639.85 IC3.19
O_D_SPI_CS: IC3.20 P2.4 | length 1088.4
  BOTTOM w9.84: IC3.20 20.47,-629.53 -290,-940 -290,-1050 -230,-1110 43.94,-1110 P2.4
O_D_SPI_MOSI: IC3.18 P2.12 | length 805.4
  BOTTOM w9.84: P2.12 -116.06,-1070 -213.63,-1070 -250,-1033.63 -250,-960 59.85,-650.15 IC3.18
Ohisje: C12.1 C36.1 C41.2 P3.1 R5.2 | length 477.2
  TOP w24: R5.2 -1097.37,689.2 -1097.37,571.17 C41.2 -1094.8,566.25 -1094.8,523.93 P3.1 -1128.89,497.44 -1150,476.33 -1150,390 -1134.02,374.02 -1075.6,374.02 -1075.6,380 -1071.85,376.25 C36.1
SH_U: C9.2 C20.2 C21.2 IC3.37 Q2.1 Q2.2 Q2.3 Q2.10 Q5.5 Q5.6 Q5.7 Q5.8 Q5.9 R16.2 R19.1 X3.1 | length 795.7
  TOP w9.84: v2(-500,-170) v2(-480,-170) v2(-460,-170) Q5.9@-460,-186.29 ; v2(-499.91,-185.38) v2(-499.91,-204.29) Q5.9@-481.14,-204.29 ; v2(-480.7,-204.73) Q5.9@-480,-204.03 ; v2(-479.65,-185.73) -480,-186.07 Q5.9@-480,-204.03 ; Q5.9@-445,-190.69 -438.24,-197.45 v2(-438.24,-204.24) -439.17,-205.16 v2(-459.1,-205.16) ; v2(-440.6,-186.29) Q5.9@-460,-186.29 ; Q5.5 -431.61,-140.31 -429.84,-138.54 C21.2 -328.54,-140 R16.2 -265.08,-140 -205.08,-200 v1(-90,-200) ; Q5.9@-480,-204.03 -478.87,-205.16 v2(-459.1,-205.16) ; Q5.9@-460,-186.29 v2(-460.09,-186.37) -460,-186.46 -460,-204.27 v2(-459.1,-205.16)
  BOTTOM w9.84: C9.2 -114.76,-63.19 -103.35,-74.61 -95.77,-74.61 -90,-80.37 v1(-90,-200) -87.36,-202.64 -87.36,-212.64 -72.79,-227.21 -58.42,-227.21 IC3.37
  other v1: -530,-190 -560,-170 -550.61,-131.38 -630,-120 -590,-120 -510,-110 -460,-110
  other v2: -440,-170
SH_V: C8.2 C22.2 C24.2 IC3.44 Q3.1 Q3.2 Q3.3 Q3.10 Q6.5 Q6.6 Q6.7 Q6.8 Q6.9 R17.2 R20.1 X4.1 | length 1638.3
  TOP w9.84: Q3.10 358.5,380.24 369.37,369.37 v1(369.37,319.51) 369.37,200.83 C22.2 ; R17.2 306.57,481.97 C24.2 v1(360,480) ; Q6.5 435.94,441.18 430,447.13 430,599.53 460.47,630 572.03,630 579.24,622.8 595.55,622.8 603.43,614.92 R20.1 ; v2(471.07,371.62) v2(471.07,411.62) 487.35,411.62 Q6.9@487.35,426.62 ; v2(486.8,391.97) 487.14,391.62 505.1,391.62 506.23,392.75 v2(506.23,412.52) ; Q6.9@487.53,411.62 505.34,411.62 v2(506.23,412.52) ; Q6.9 488.5,373.76 v2(486.45,371.71) v2(505.36,371.71) Q6.9@505.36,390.48 ; Q6.9@491.76,426.62 498.52,433.38 v2(505.3,433.38) 506.23,432.45 v2(506.23,412.52)
  BOTTOM w9.84: IC3.44 79.53,-136.44 94.92,-121.06 94.92,-114.92 C8.2@97.99,-117.99 ; C8.2 104.24,-95.59 104.24,-39.71 369.37,225.42 v1(369.37,319.51)
  other v1: 410,370 410,400 410,430 524.68,467.76 450,470 490,470 470,490 510,490 540,490
  other v2: 505.8,390.92 471.07,391.62 487.44,411.53 487.36,431.02 471.07,431.62
SH_W: C7.2 C23.2 C25.2 IC3.47 Q4.1 Q4.2 Q4.3 Q4.10 Q7.5 Q7.6 Q7.7 Q7.8 Q7.9 R18.2 R21.1 X5.1 | length 772.1
  TOP w9.84: v1(340,-90) C23.2 ; v2(440,-190) v2(460,-190) v2(480,-190) Q7.9@480,-206.29 ; v2(440.09,-205.38) v2(440.09,-224.29) Q7.9@458.86,-224.29 ; v2(459.3,-224.73) Q7.9@460,-224.03 ; v2(460.35,-205.73) 460,-206.07 Q7.9@460,-224.03 ; Q7.9@495,-210.69 501.76,-217.45 v2(501.76,-224.24) 499.97,-226.02 v2(479.91,-226.02) ; v2(499.4,-206.29) Q7.9@480,-206.29 ; C25.2 C25.2@603.94,11.46 ; R18.2 653.32,173.15 676.08,150.39 X5.1@696.85,150.39 ; Q7.9@460,-224.03 477.92,-224.03 v2(479.91,-226.02) ; v2(479.91,-226.02) 480,-225.93 480,-206.46 v2(479.91,-206.37) Q7.9@480,-206.29
  TOP w23.62: C23.2 342.91,-40 440,-40 450,-30
  BOTTOM w9.84: IC3.47 139.18,-226.75 139.18,-195.87 155.05,-180 232.05,-180 256.81,-155.24 C7.2 283.19,-155.24 337.36,-101.06 337.36,-92.64 v1(340,-90)
  other v1: 410,-230 550,-230 407.83,-202.43 550,-190 407.83,-167.98 550,-150 420,-130 450,-130 480,-130 510,-130 540,-120
  other v2: 500,-190
SL_U: C26.2 C27.2 IC3.40 Q5.1 Q5.2 Q5.3 Q5.10 R2.2 R25.2 R35.2 | length 994.5
  TOP w7.87: C26.2 -551.81,-317.09 -508.39,-273.66 Q5.1 ; -457.2,-323.27 -457.2,-322.8 ; Q5.3 -457.2,-322.8 ; C27.2 -329.88,-193.43 R25.2 -265.08,-193.43 -230,-228.5 ; v1(-10,-180) -58.5,-228.5 -230,-228.5 ; -457.2,-322.8 -440,-340 -316.58,-340 -311.97,-335.39 -311.97,-286.58 -305.39,-280 -240,-280 -230,-270 -230,-228.5
  TOP w24: Q5.10@-482.8,-260 Q5.2 v1(-482.8,-307.43) -482.8,-347.2 R2.2@-480,-350
  BOTTOM w9.84: v1(-10,-180) -10,-183.73 0.2,-193.92 0.2,-226.75 IC3.40
SL_V: C28.2 C30.2 IC3.41 Q6.1 Q6.2 Q6.3 Q6.10 R1.2 R26.2 R36.2 | length 2064.7
  TOP w9.84: C30.2 491.97,656.57 R26.2 704.89,656.57 v1(765.58,595.89) ; C28.2 658.54,490 755.87,490 R36.2@770,504.13 ; v1@770,591.47 v1(765.58,595.89) ; R1.2 838.36,561.5 801,524.13 R36.2 765.58,528.55 v1(765.58,595.89)
  BOTTOM w9.84: IC3.41 20,-226.87 20,-170 -50,-100 -50,170 347.56,567.56 737.25,567.56 v1(765.58,595.89)
SL_W: IC3.2 K1.2 | length 234.3
  TOP w9.84: v1(300,-260) 303.73,-260 308.81,-265.08 325.04,-265.08 K1.2
  BOTTOM w9.84: IC3.2 182.63,-306.87 176.87,-301.1 176.87,-273.13 190,-260 v1(300,-260)
SN_U: C4.1 C6.2 IC3.4 R4.1 | length 1188.2
  TOP w9.84: C6.2 -603.11,-497.36 -589.31,-497.36 -570,-516.67 -570,-570 -550,-590 R4.1 -381.5,-593.94 -345.43,-630 51.12,-630 140.5,-540.62 140.5,-369.5 v1(160,-350) ; C6.2@-600,-490.47 C4.1
  BOTTOM w9.84: v1(160,-350) 163.73,-350 167.48,-346.25 IC3.4
SN_V: C3.1 C5.2 IC3.6 R3.1 | length 1546.8
  TOP w9.84: v1(940,390) 939.76,390.24 890.24,390.24 C3.1 R3.1 891.5,340 C5.2
  BOTTOM w9.84: IC3.6 514.37,-385.63 610,-290 610,150 680,220 900,220 940,260 v1(940,390)
SO_U: IC3.26 P1.4 | length 909.1
  BOTTOM w9.84: P1.4 -311.46,-821.46 -160,-670 -160,-490 -154.08,-484.08 IC3.26
SO_V: IC3.25 P1.8 | length 978.3
  BOTTOM w9.84: P1.8 -351.93,-921.46 -90,-659.53 -90,-520 -100,-510 -100,-504.35 -100.58,-503.77 IC3.25
SP_U: C2.1 C4.2 IC3.3 R2.1 | length 1693.6
  TOP w9.84: R2.1 -541.5,-353.94 -568.03,-380.47 C4.2 C2.1 -660.24,-380.24 -709.76,-380.24 v1(-710,-380) -740,-410 -740,-560 -650,-650 70,-650 230,-490 230,-380 v1(280,-330)
  BOTTOM w9.84: IC3.3 272.83,-326.56 276.27,-330 v1(280,-330)
SP_V: C1.1 C3.2 IC3.5 R1.1 | length 1633.5
  TOP w9.84: C3.2 R1.1 900.83,509.33 929.33,509.33 v1(940,520) 940.24,520.24 940.24,569.76 C1.1
  BOTTOM w9.84: IC3.5 504.06,-365.94 582.44,-287.56 582.44,152.44 670,240 880,240 911.27,271.27 911.27,401.27 940,430 v1(940,520)
V_BAT_PLUS: C39.1 C40.1 C42.1 IC1.3 IC1.6 Q1.1 Q1.2 Q1.3 Q1.10 X12.1 | length 0.9
  TOP w95: X12.1@-585.3,930.84 X12.1@-584.65,931.5
VBAT_PROT: C43.1 FL1.1 IC1.4 L1.1 Q1.5 Q1.6 Q1.7 Q1.8 Q1.9 | length 420
  TOP w9.84: IC1.4 -370,894.96 -364.23,889.2 -319.2,889.2 Q1.9 ; v2(-339.4,876.29) -335,876.29 Q1.9@-320,876.29 ; Q1.9@-335,880.69 -341.76,887.45 v2(-341.76,894.24) -340.83,895.16 v2(-320.9,895.16) ; v2(-300.35,875.73) -300,876.07 Q1.9@-300,894.03 ; v2(-299.3,894.73) Q1.9@-300,894.03 ; Q1.9@-298.86,894.29 v2(-280.09,894.29) v2(-280.09,875.38) ; v2(-280,860) v2(-300,860) v2(-320,860) Q1.9@-320,876.29 ; v2(-320.9,895.16) -320,894.27 -320,889.2 -320,876.46 v2(-319.91,876.37) Q1.9@-320,876.29 ; v2(-320.9,895.16) -301.13,895.16 Q1.9@-300,894.03
  other v2: -340,860
pads on no net: IC3.22 IC3.24

## Polygon pours and split planes (outlines as drawn)
GND on TOP "GND_L01_P038" (solid, pour order 38): -21.06,-300.91 121.06,-300.91 121.06,-490.04 -21.06,-490.04
DC_LINK on TOP "DC_LINK_L01_P027" (solid, remove dead copper, pour order 27): -1463.74,1272.13 -1403.74,1212.13 1186.26,1212.13 1186.26,-1237.87 1046.26,-1377.87 996.26,-1327.87 -1533.74,-1327.87
GND on TOP "GND_L01_P025" (solid, pour order 25): 500,-255.15 380,-255.15 380,-286.01 380,-323.75 500,-324.85
SH_V on TOP "SH_V_L01_P024" (solid, pour order 24): -191.73,1039.72 -200,1031.45 -200,659.03 96.55,362.48 560,362.48 560,700 210,1050
SL_V on TOP "SL_V_L01_P021" (solid, pour order 21): 545.45,407.75 545.45,344.97 550.42,340 770,340 840,410 840,540 700,540 590,430 590,410
SH_W on TOP "SH_W_L01_P020" (solid, pour order 20): 1029.67,193.7 1027.54,191.58 653.54,191.58 653.54,123.54 530,0 400,0 400,-250 570,-250 630,-190 632.91,-192.91 1040.16,-192.91
SH_U on TOP "SH_U_L01_P018" (solid, remove dead copper, pour order 18): -1034.34,191.93 -1031.78,189.37 -653.54,189.37 -653.54,53.54 -600,0 -450,0 -450,-60.48 -430,-80.48 -430,-220 -520,-220 -545.31,-194.69 -1031.85,-194.69
SL_U on TOP "SL_U_L01_P017" (solid, pour order 17): -514.73,-246.16 -452,-246.16 -450.69,-247.47 -455.05,-251.82 -455.05,-395.05 -480,-420 -520,-420 -520,-250
GND on TOP "GND_L01_P015" (solid, pour order 15): -965.55,439.54 -970,435.09 -970,300 -800,300 -800,440
GND_IN on TOP "GND_IN_L01_P013" (solid, pour order 13): -923.81,1183.42 -913.81,1173.42 -703.81,1173.42 -703.81,873.42 -713.81,863.42 -753.81,863.42 -753.81,613.42 -638.89,510 -270.82,510 -163.81,393.42 -33.81,393.42 -33.81,183.42 -53.81,163.42 -373.81,443.42 -879.36,443.42 -973.81,563.42 -973.81,1183.42
VBAT_PROT on TOP "VBAT_PROT_L01_P012" (solid, pour order 12): -220,920 -410,920 -470,860 -740,860 -740,610 -645.65,536.68 -30,521.34 -30,610 -200,610 -220,630
V_BAT_PLUS on TOP "V_BAT_PLUS_L01_P010" (solid, pour order 10): -680,1190 -700,1170 -700,870 -480,870 -420,930 -240,930 -200.47,969.53 -200.47,1190
GND on 2 "GND_L02_P019" (solid, pour order 19): -1310,1240 -1280,1210 1110,1210 1110,750 1240,620 1240,-1280 -1190,-1280 -1320,-1150
GND_IN on 2 "GND_IN_L02_P011" (solid, pour order 11): -955.71,1200 -210,1200 -180,1170 -210,1140 -210,440 -50,440 20,370 20,164.09 5.51,149.61 -222.37,149.61 -222.37,242.37 -430,450 -949.08,450
GND on BOTTOM "GND_L04_P037" (solid, remove dead copper, pour order 37): -1430,1420 1860,1420 1960,1320 1790,1150 1790,-1640 -1900,-1640 -1950,-1690
SH_V on BOTTOM "SH_V_L04_P036" (solid, pour order 36): 389.88,504.21 391.15,502.95 391.15,298.46 614.74,298.46 618.23,301.95 618.23,506.35
DC_LINK on BOTTOM "DC_LINK_L04_P035" (solid, pour order 35): 177.56,335.84 177.28,335.56 177.28,217.83 348.8,217.83 360,229.04 360,370 177.56,370
DC_LINK on BOTTOM "DC_LINK_L04_P034" (solid, pour order 34): 374.06,149.61 582.28,149.61 582.44,149.45 582.44,-78.23 374.71,-78.23 374.06,-77.57
SH_W on BOTTOM "SH_W_L04_P033" (solid, pour order 33): 370,-250 571.23,-250 577.13,-244.11 577.13,-107.83 372.72,-107.83 368.46,-103.58 368.46,-110.25
SH_U on BOTTOM "SH_U_L04_P032" (solid, pour order 32): -650.39,-79.72 -440.28,-79.72 -380,-140 -380,-270 -574.87,-270 -650.39,-270
VBAT_PROT on BOTTOM "VBAT_PROT_L04_P031" (solid, pour order 31): -486.08,1009.69 -485.81,1009.41 -218.67,1009.41 -218.67,689.69 -486.08,689.69
DC_LINK on BOTTOM "DC_LINK_L04_P028" (solid, pour order 28): -573.15,148.62 -572.17,149.61 -364.67,149.61 -364.67,-77.36 -368.77,-81.46 -372.63,-77.6 -574.33,-77.6
GND on 3 "GND_L03_P043" (solid, pour order 43): -1460,1250 -1450,1240 1320,1240 1320,-1510 1270,-1460 -1480,-1460
SH_V on 3 "SH_V_L03_P042" (solid, pour order 42): -210,1040 -210,640 86.91,640 406.91,320 600,320 600,510 600,660 210,1050
SH_W on 3 "SH_W_L03_P041" (solid, pour order 41): 400,-260 402.59,-262.59 745.22,-262.59 814.9,-192.91 1032.91,-192.91 1040,-200 1040.16,-199.84 1040.16,193.7 629.74,193.7 570.87,134.82 570.87,-70 400,-70
SH_U on 3 "SH_U_L03_P039" (solid, pour order 39): -1030.37,191.93 -1022.3,200 -650,200 -650,50 -540,-60 -420,-60 -420,-250 -1040,-250

## Other copper
2:
  pour cut-out: -192.91,1031.5 -192.91,654.41 200.79,654.41 200.79,1031.5

## Silkscreen, mask and mechanical layers (free items; w line width, h text height)
Top Overlay:
  drawing of 21 lines, arcs and shapes, not listed
  text "EMC 2026 / Matej Knific / Aljaz Hojnik" at 65,810 h60
Mechanical 3: